# Altium PCB PCB1.PcbDoc (part 1 of 4)
Units mm, origin at the board's own origin, x right, y up, seen from the top; angles counter-clockwise.
Board outline 159.38 x 83.25 mm, 8 copper layers (Top Layer 1, GND, Signal 1, Signal 2, Power, Signal 3, Signal 4, Bottom Layer), stack 1.998 mm thick; 345 components, 291 nets, 1244 pads, 614 vias.
Unrouted connection lines stored in the file: 12.
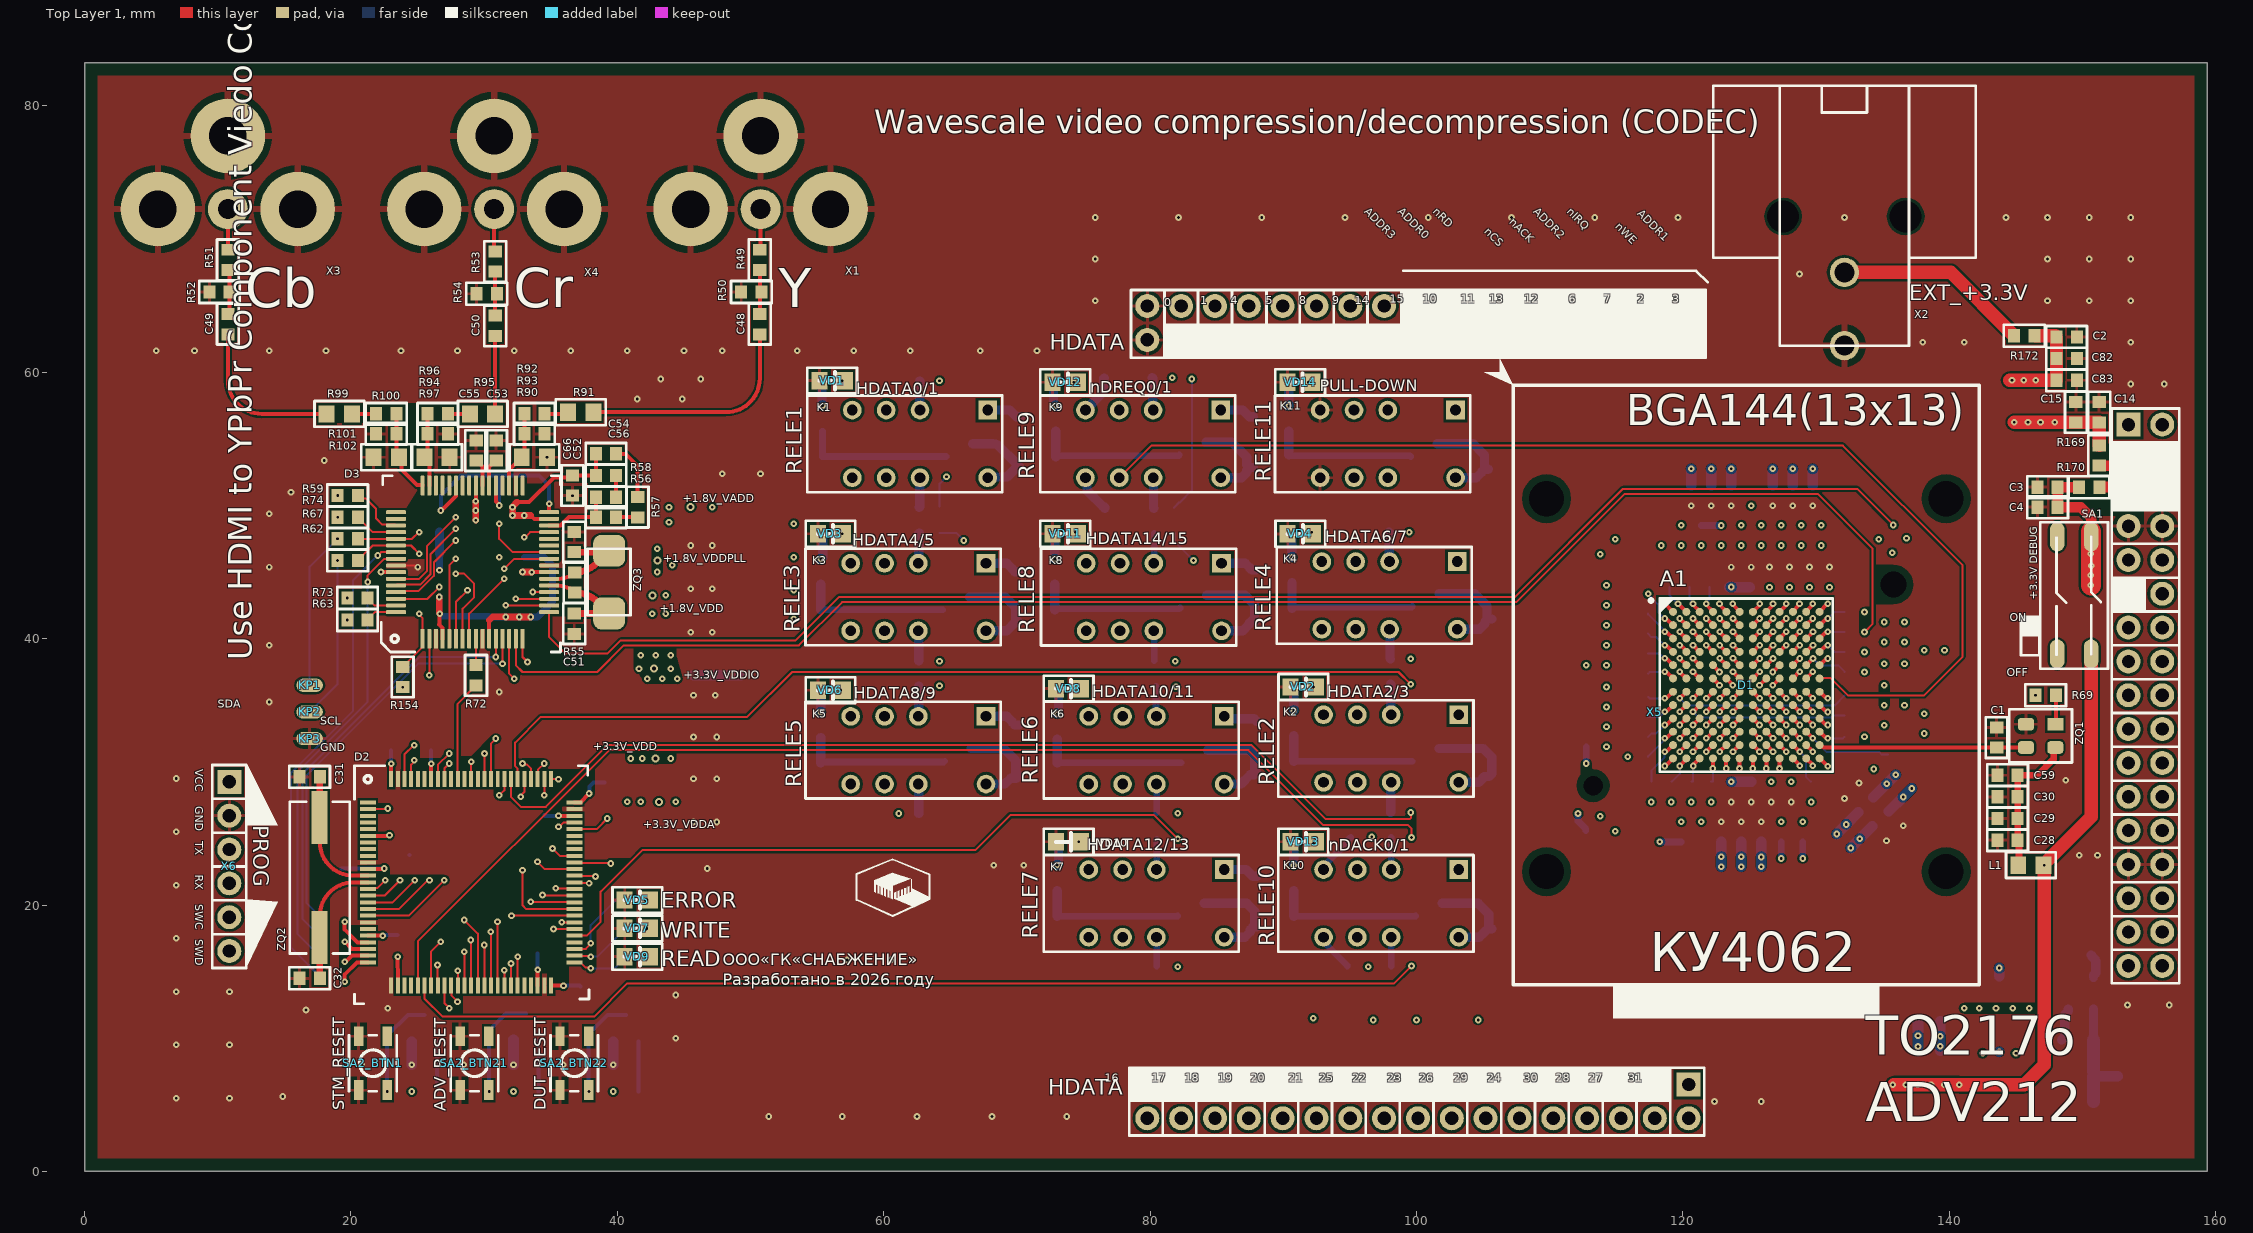
[diagram p0: Top Layer 1 view]
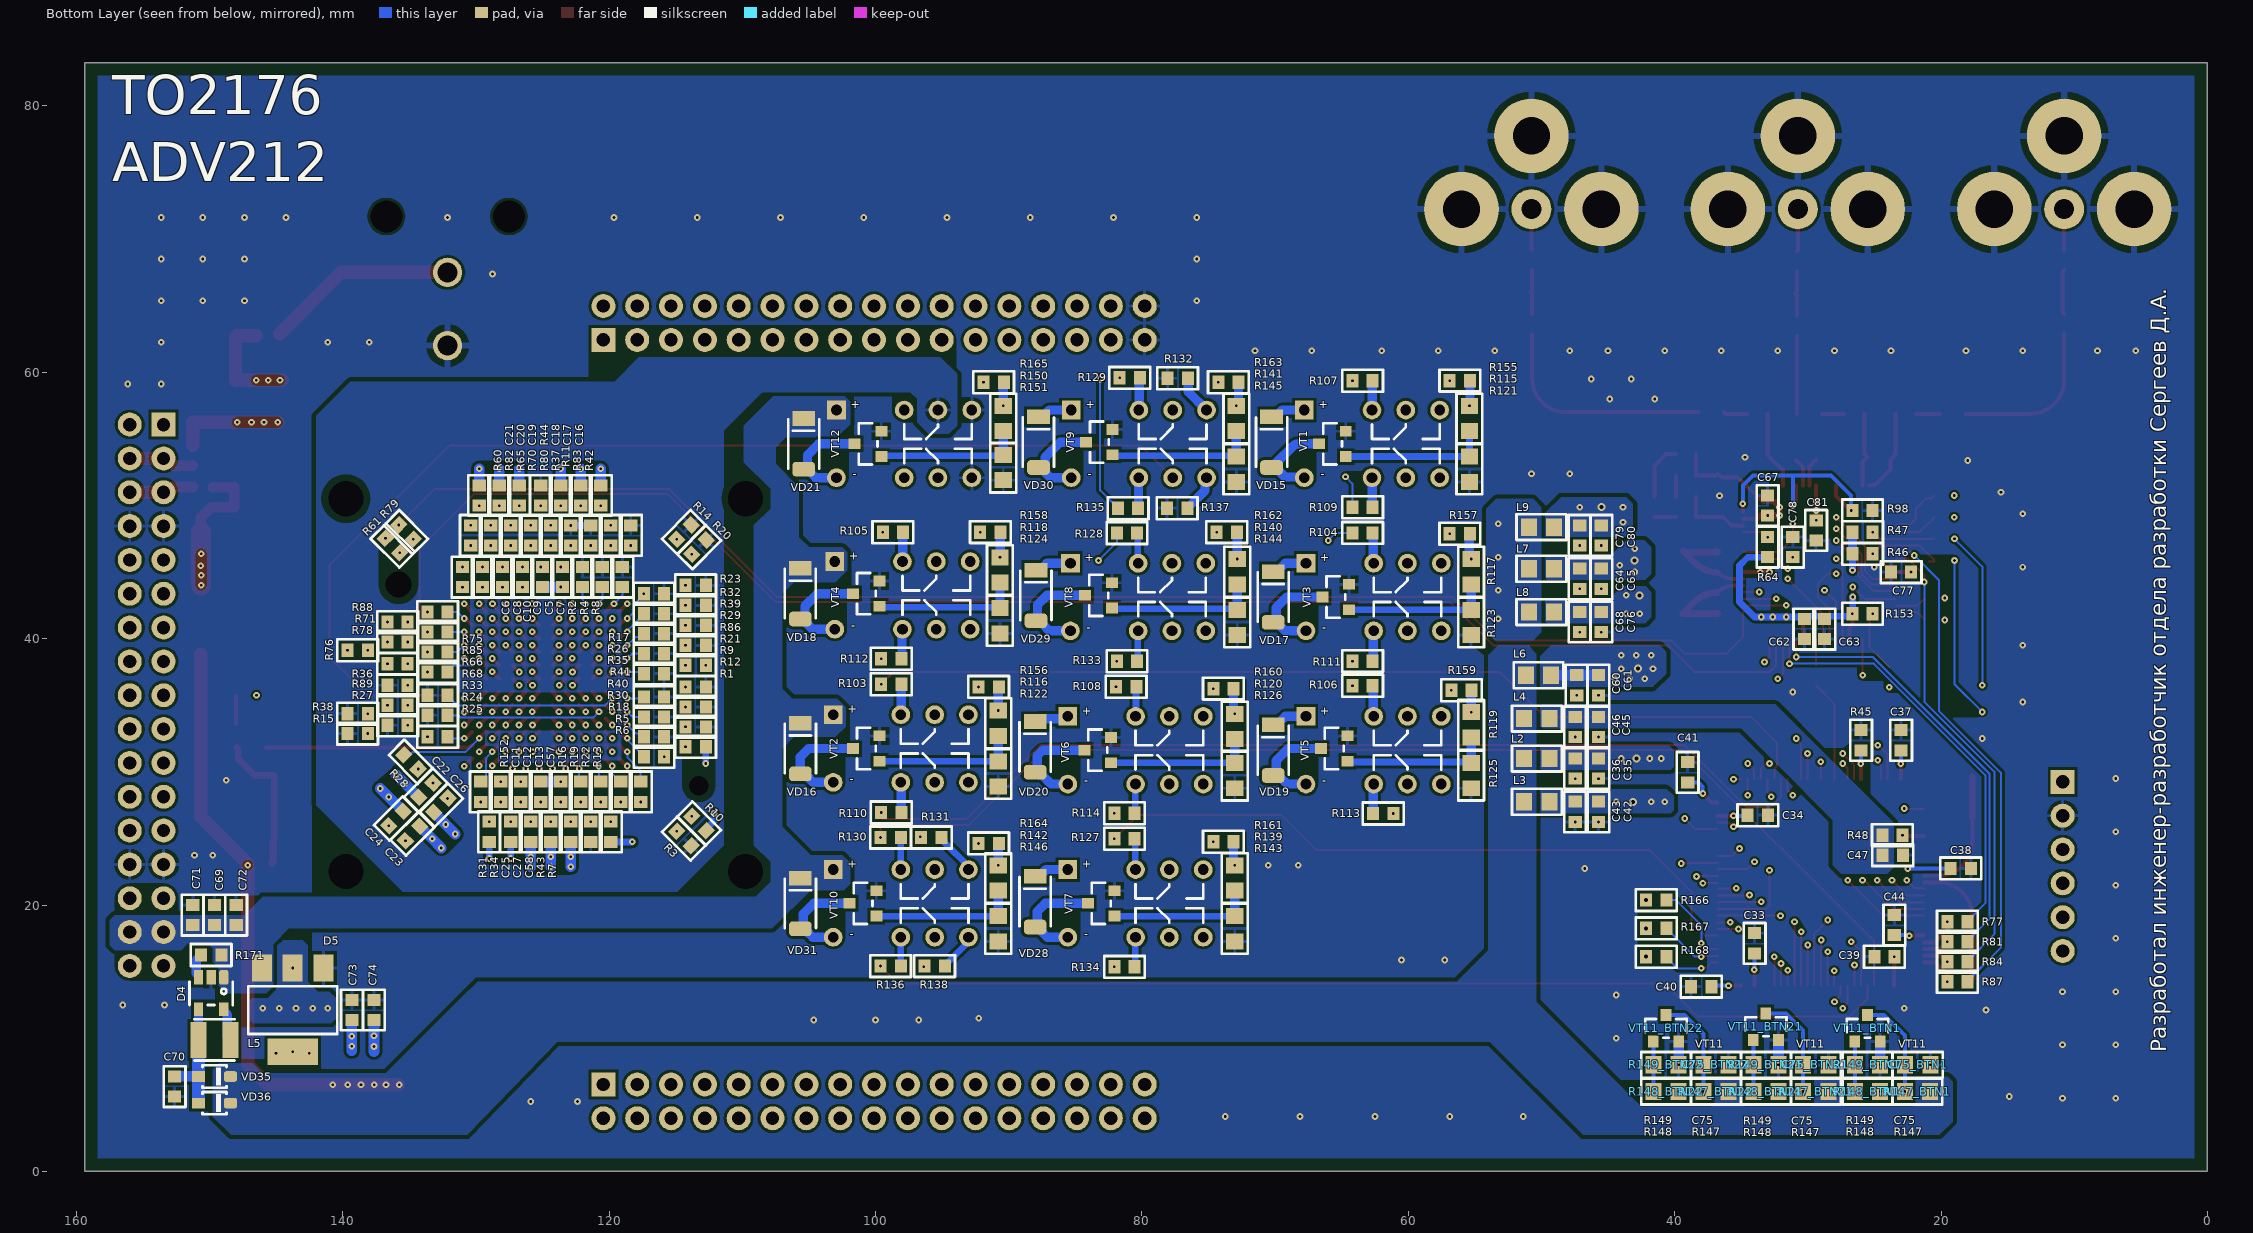
[diagram p1: Bottom Layer view, seen from below]
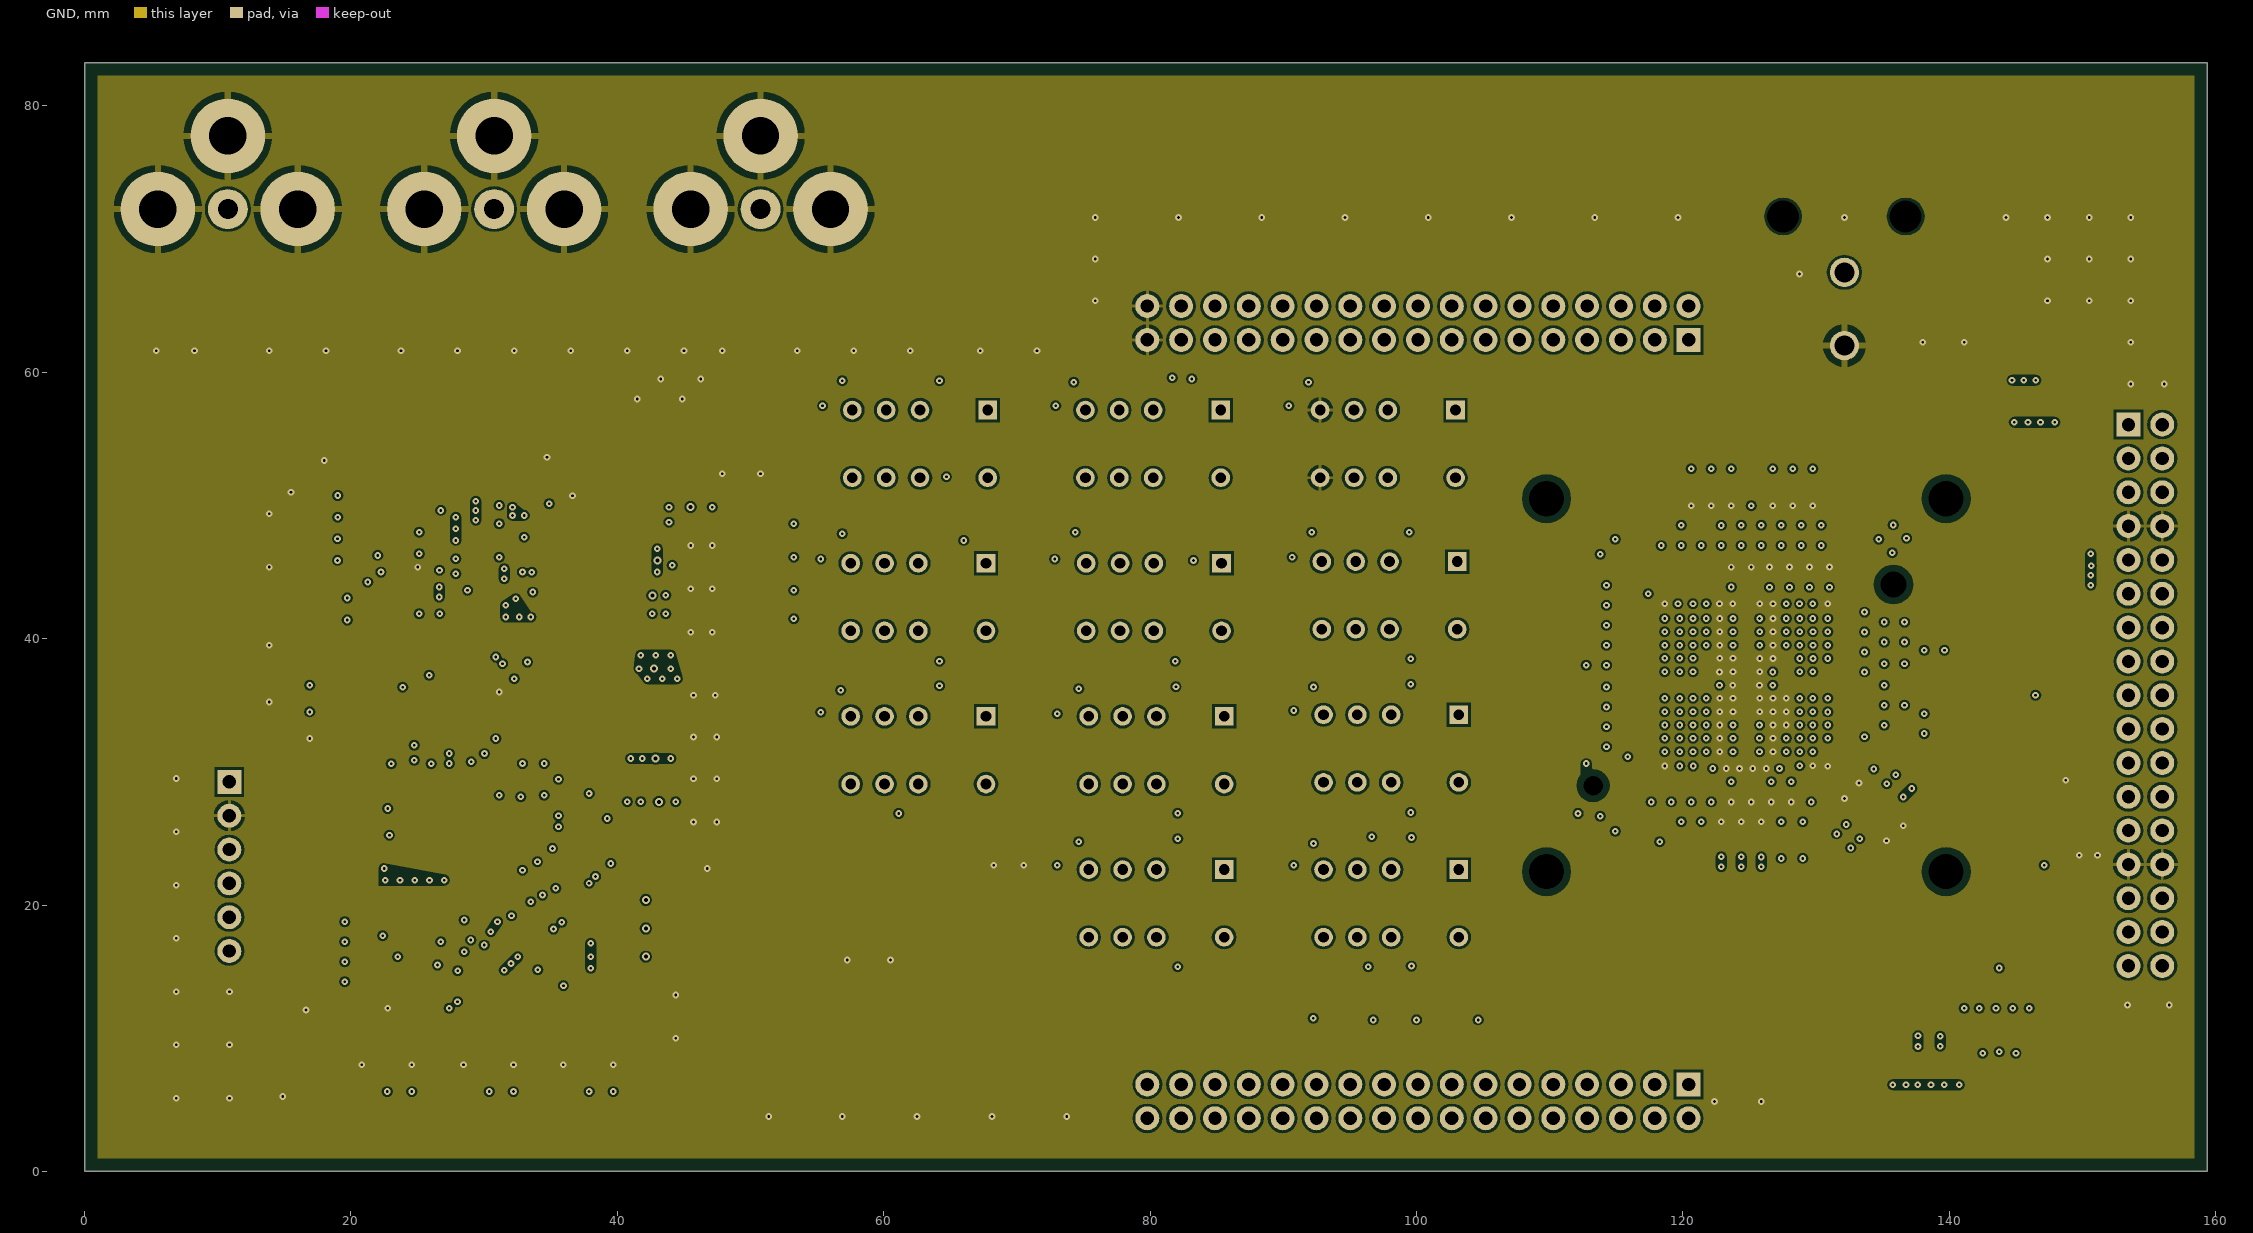
[diagram p2: GND]
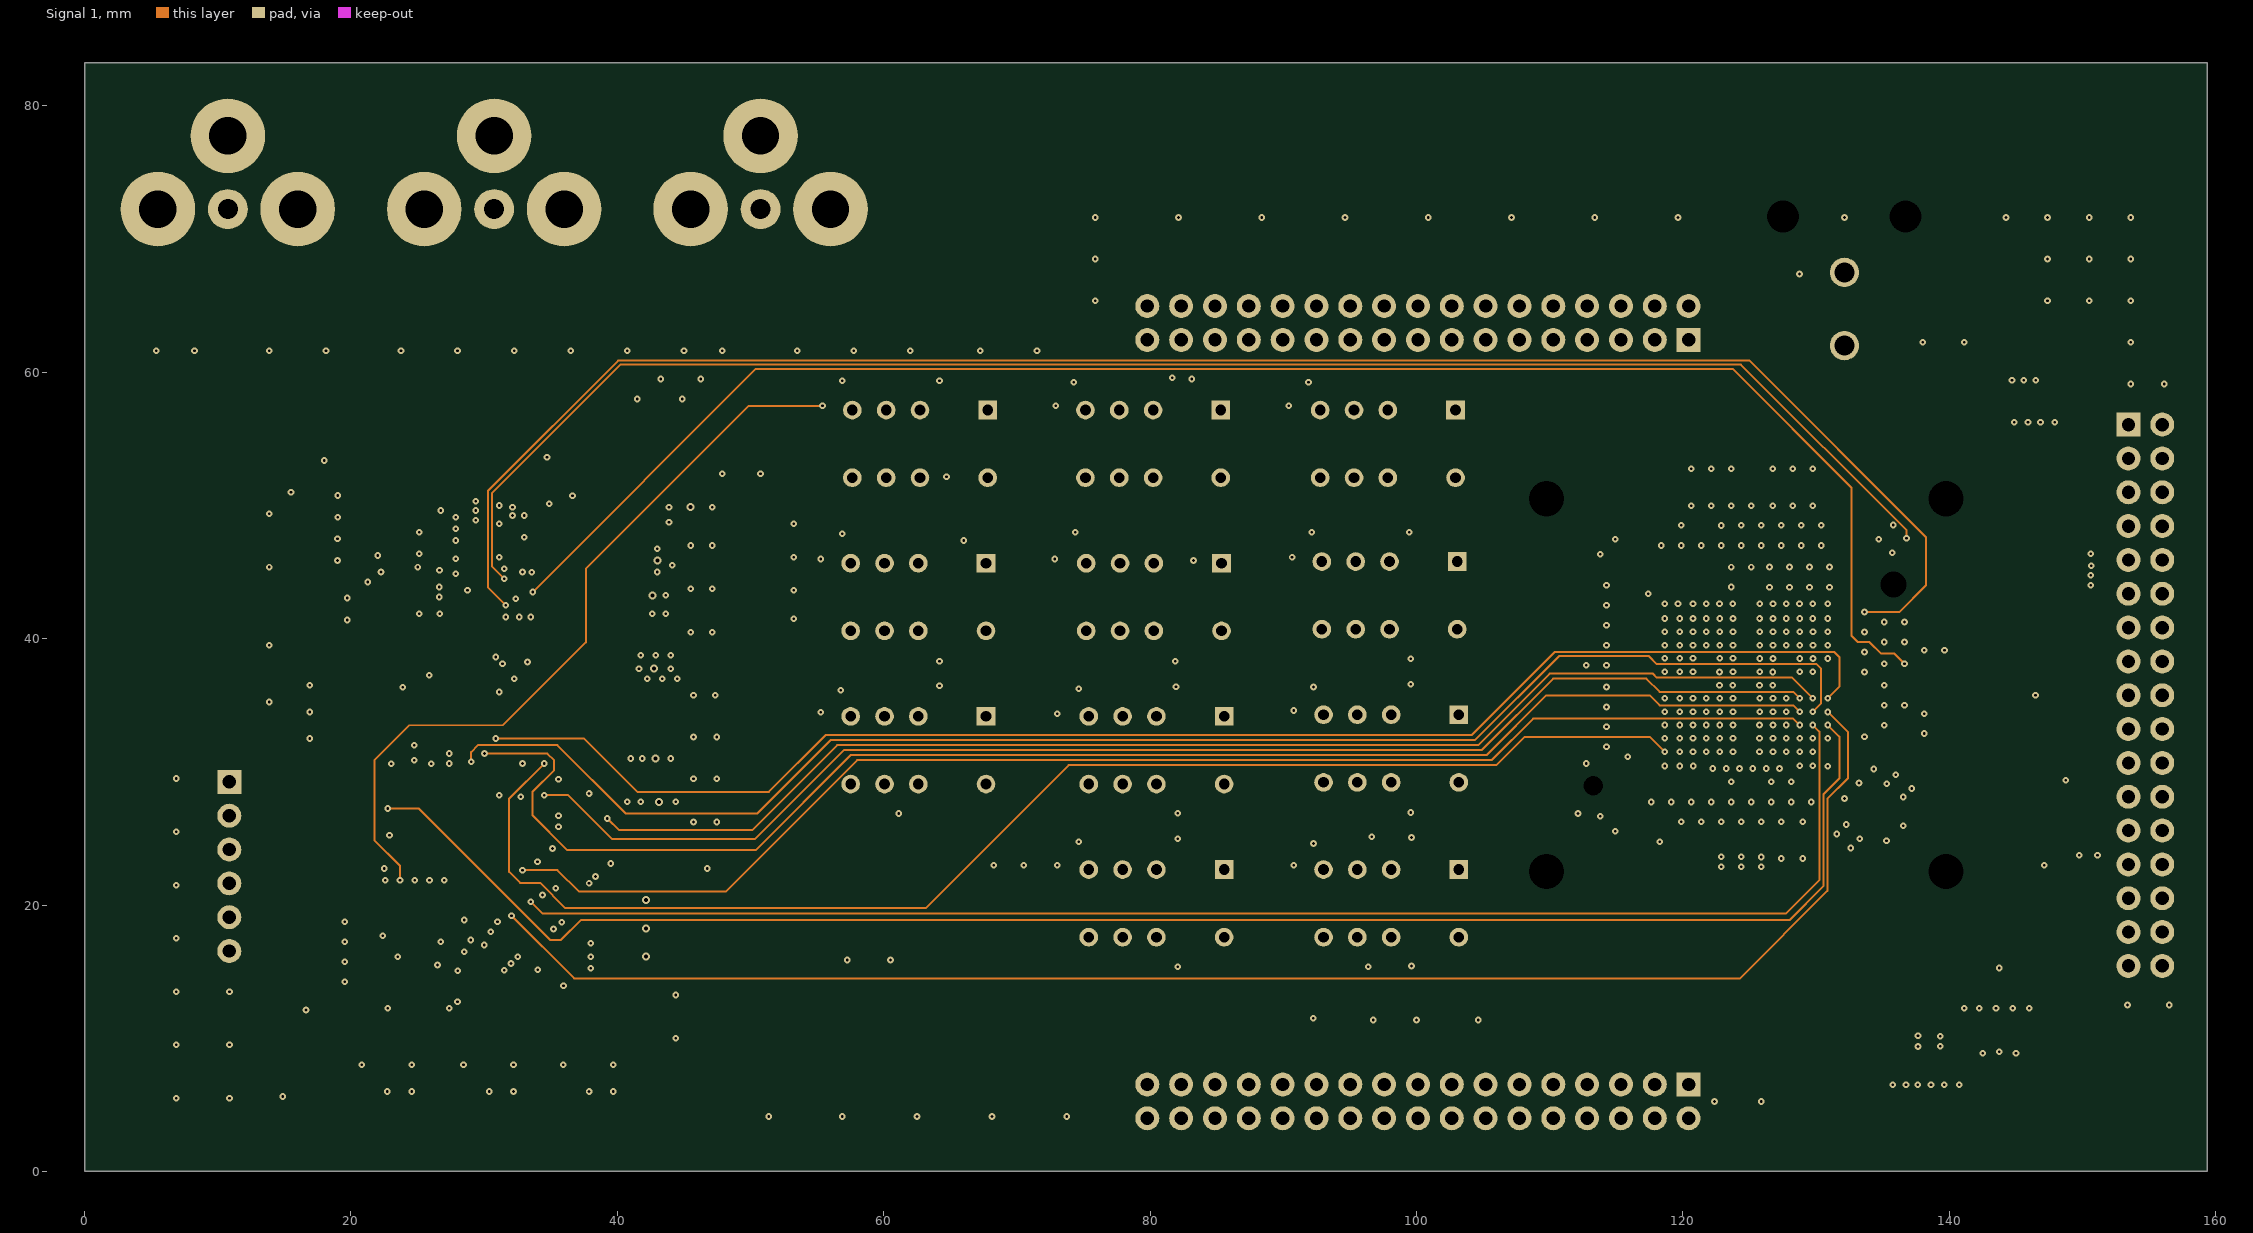
[diagram p3: Signal 1]
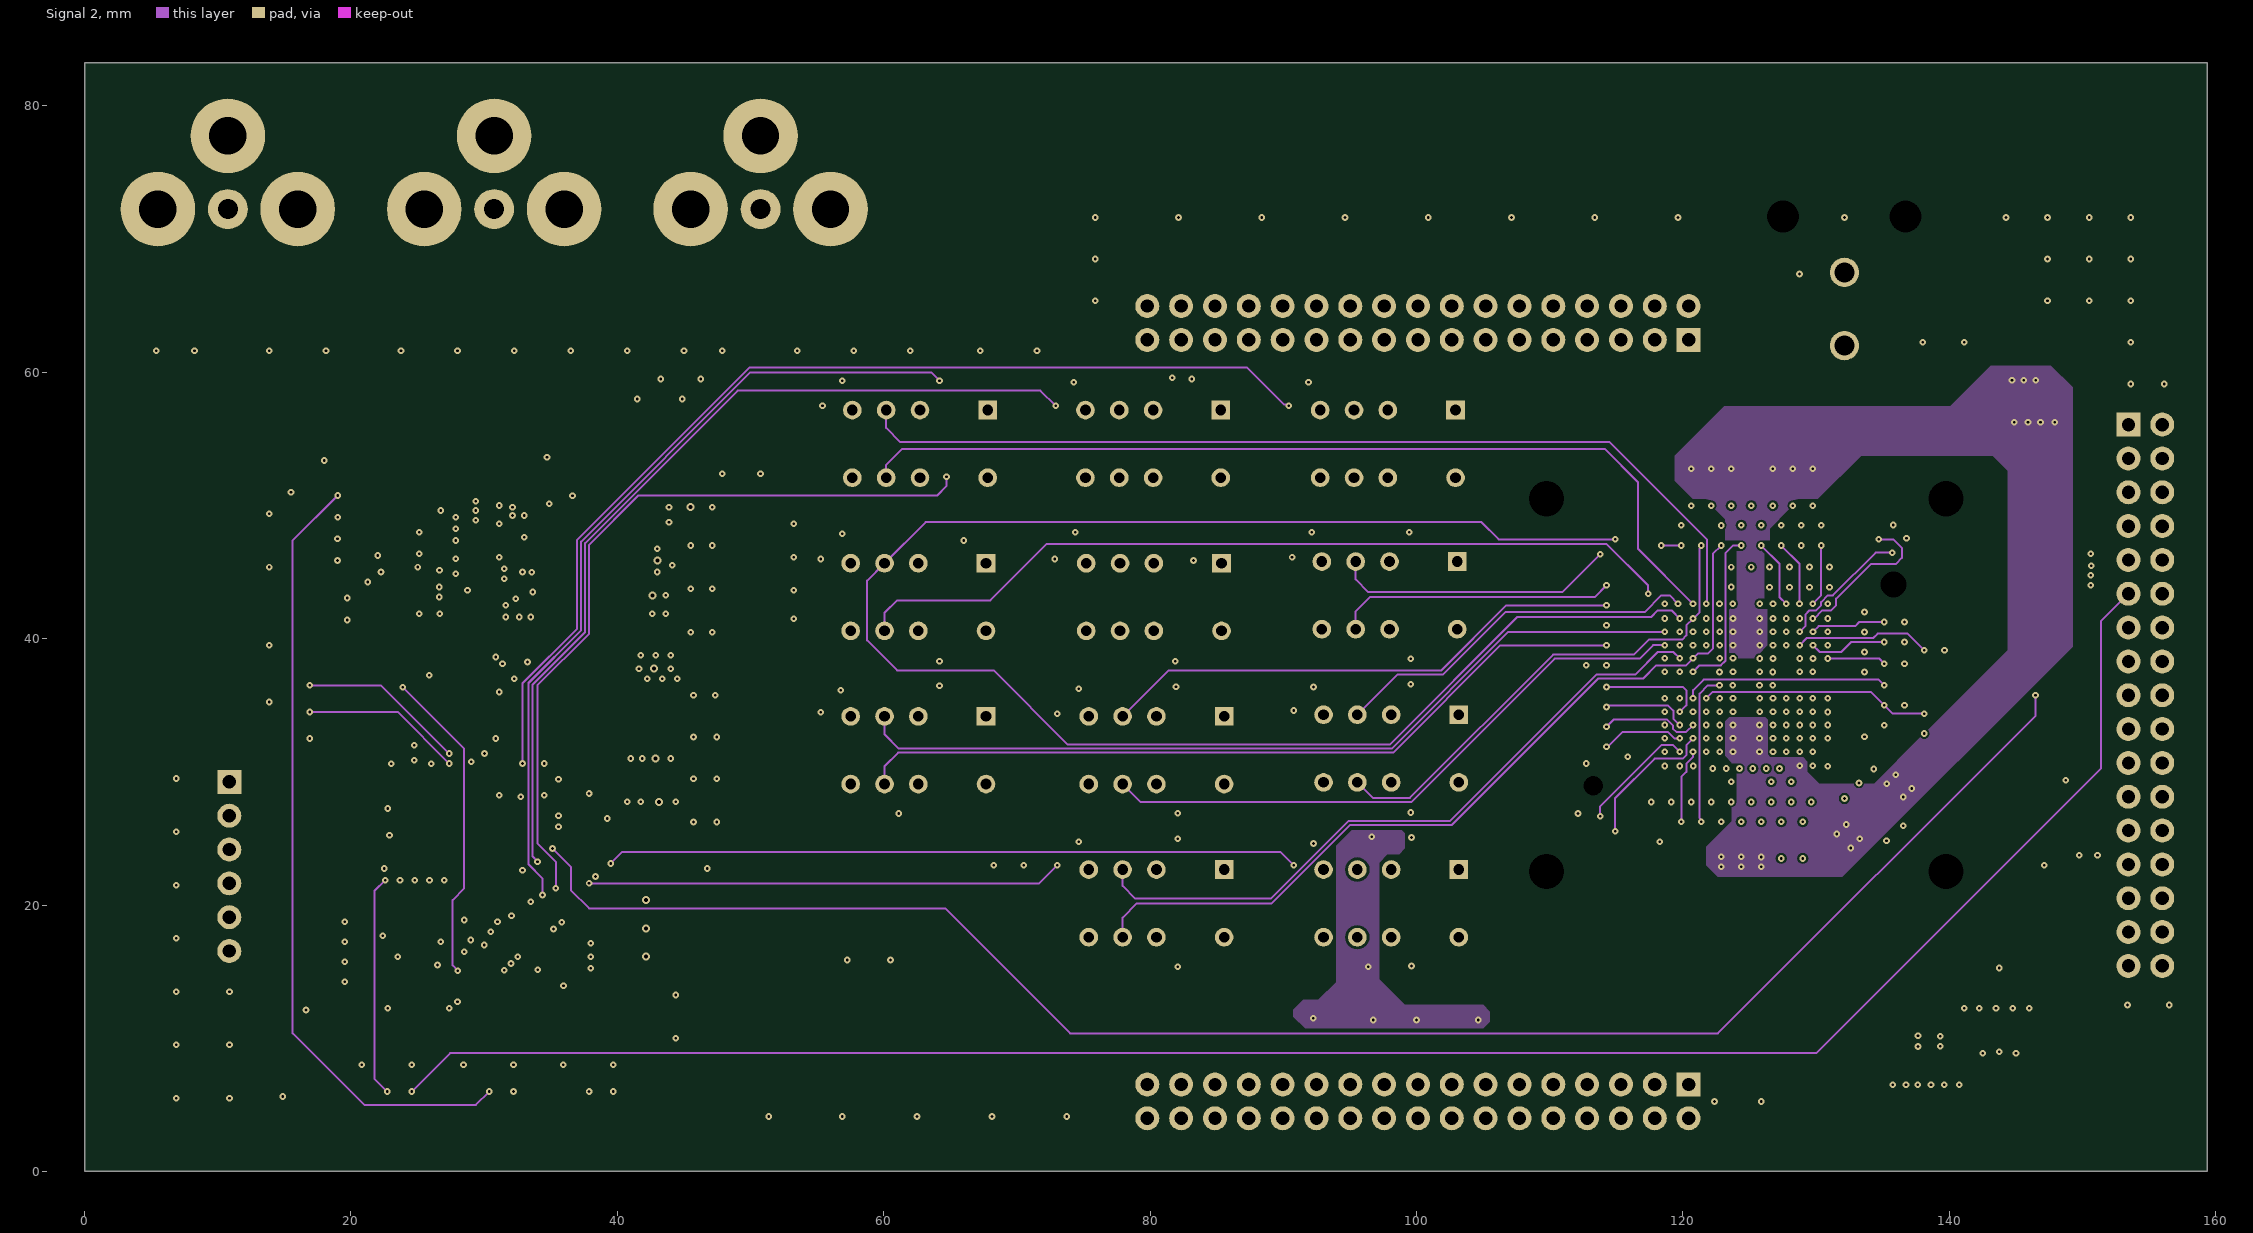
[diagram p4: Signal 2]
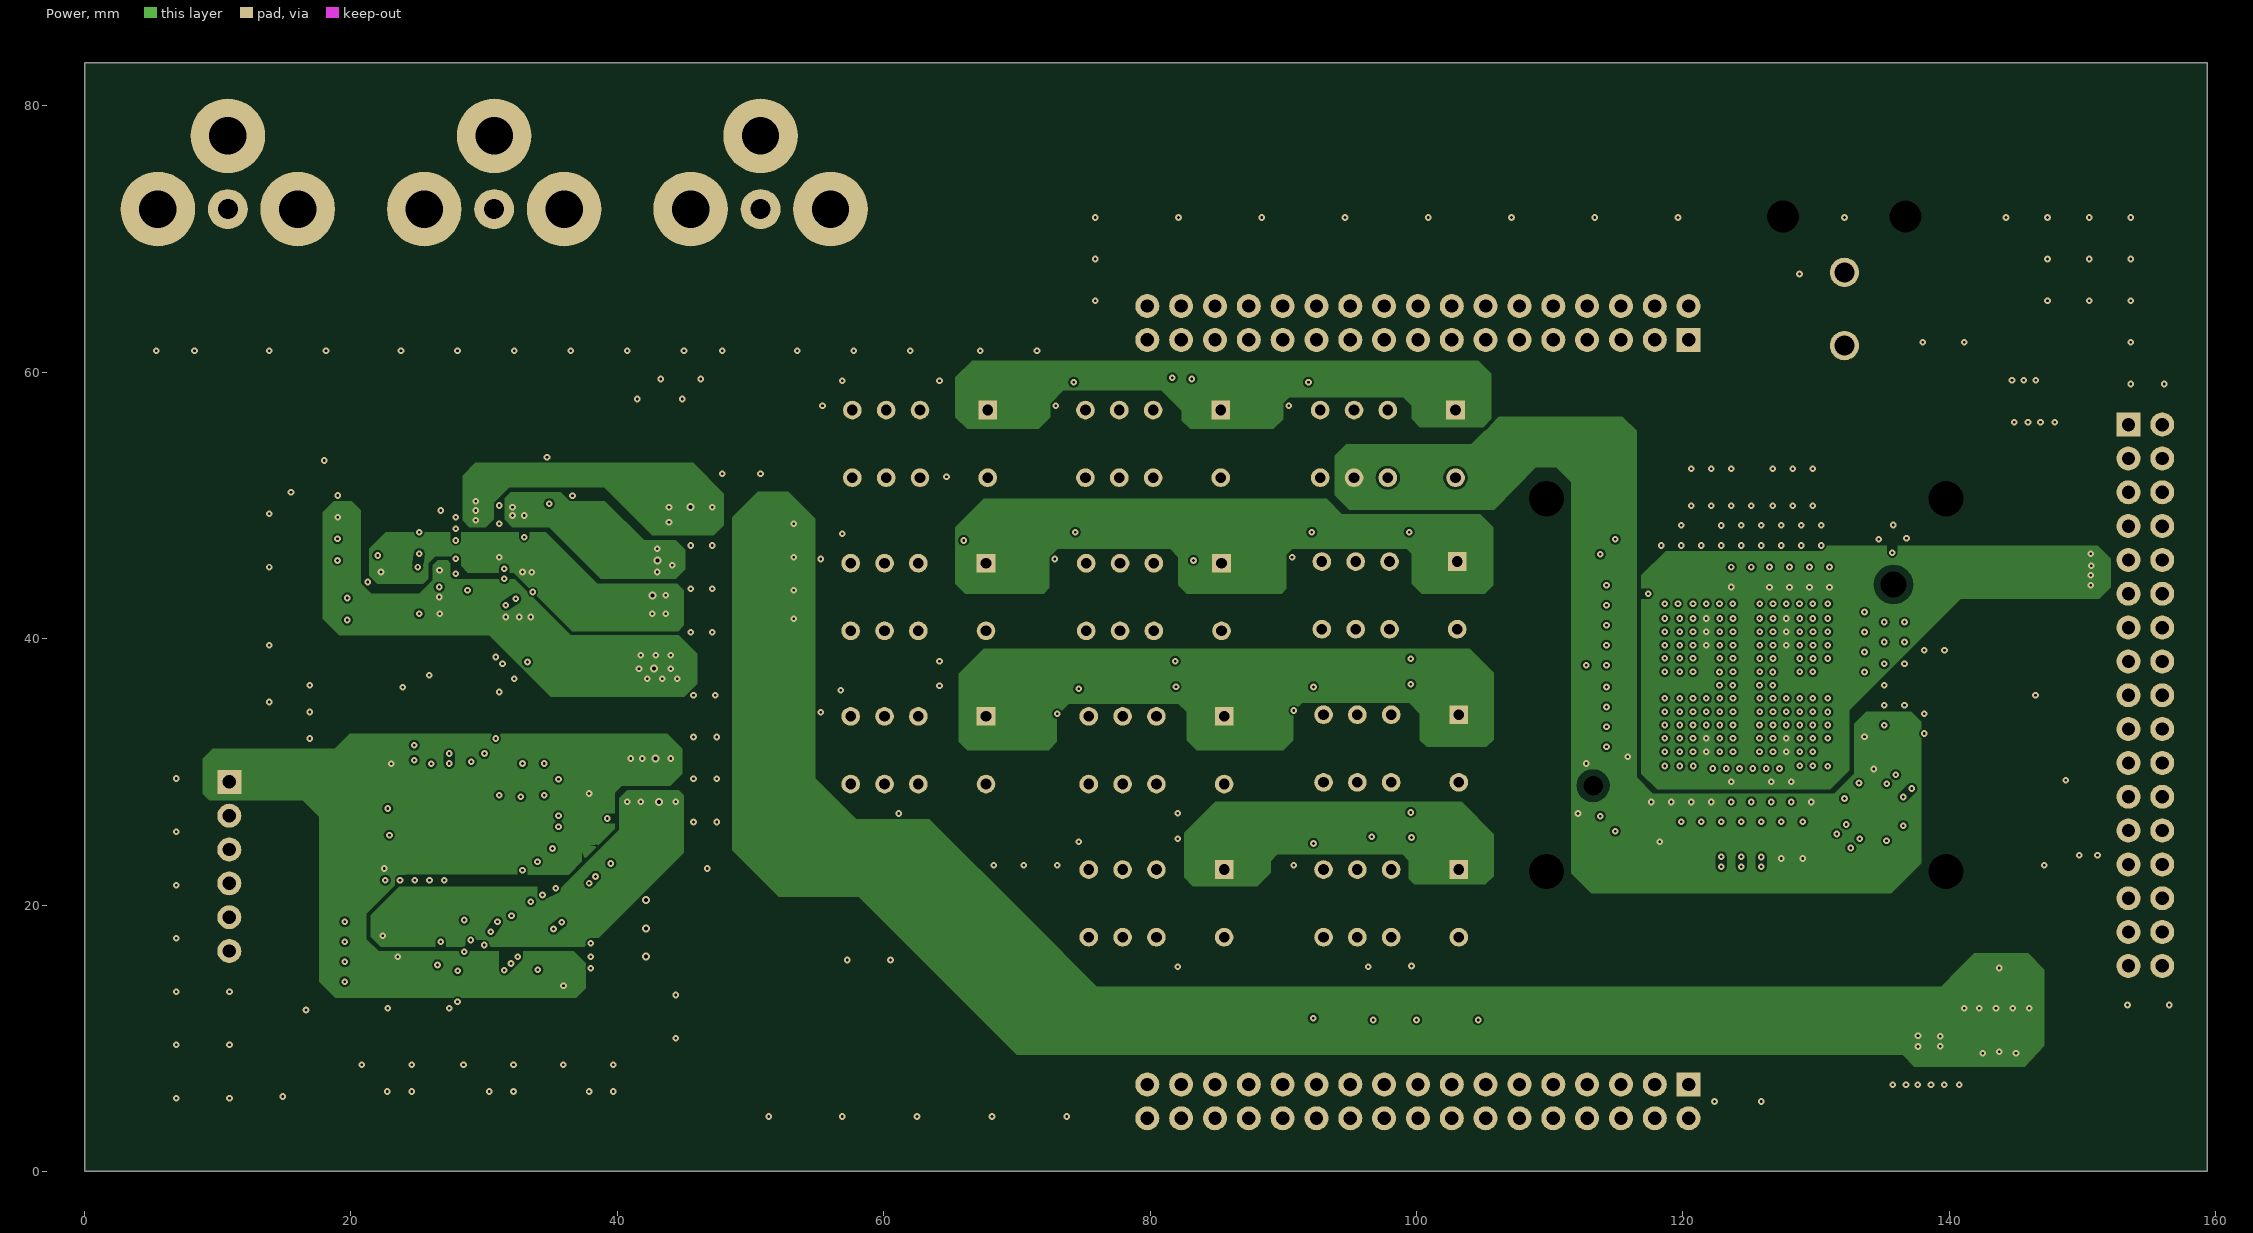
[diagram p5: Power]
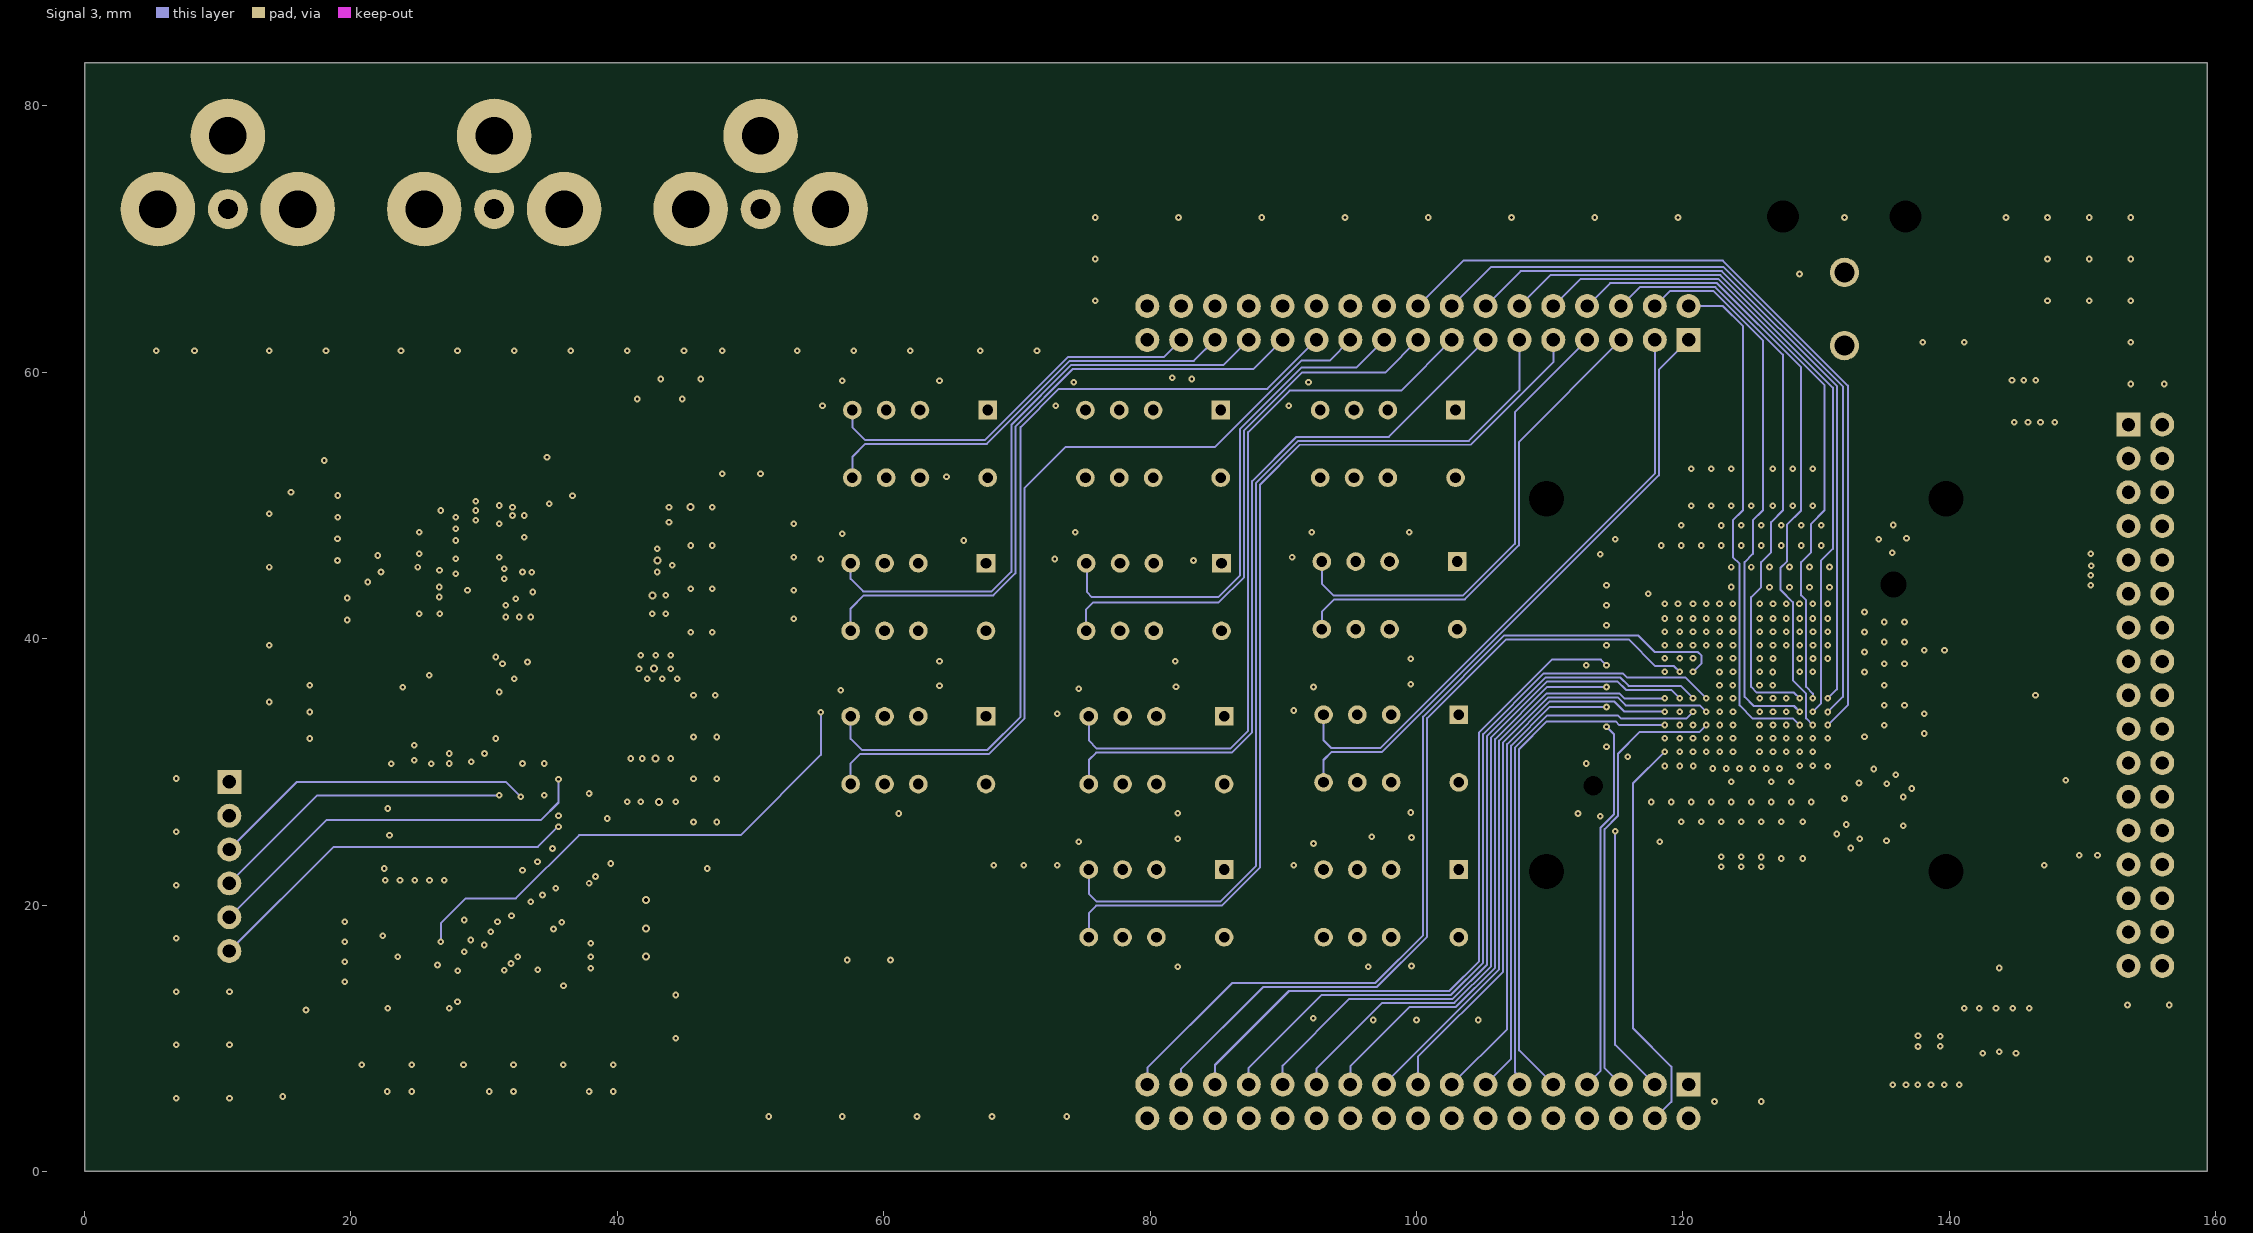
[diagram p6: Signal 3]
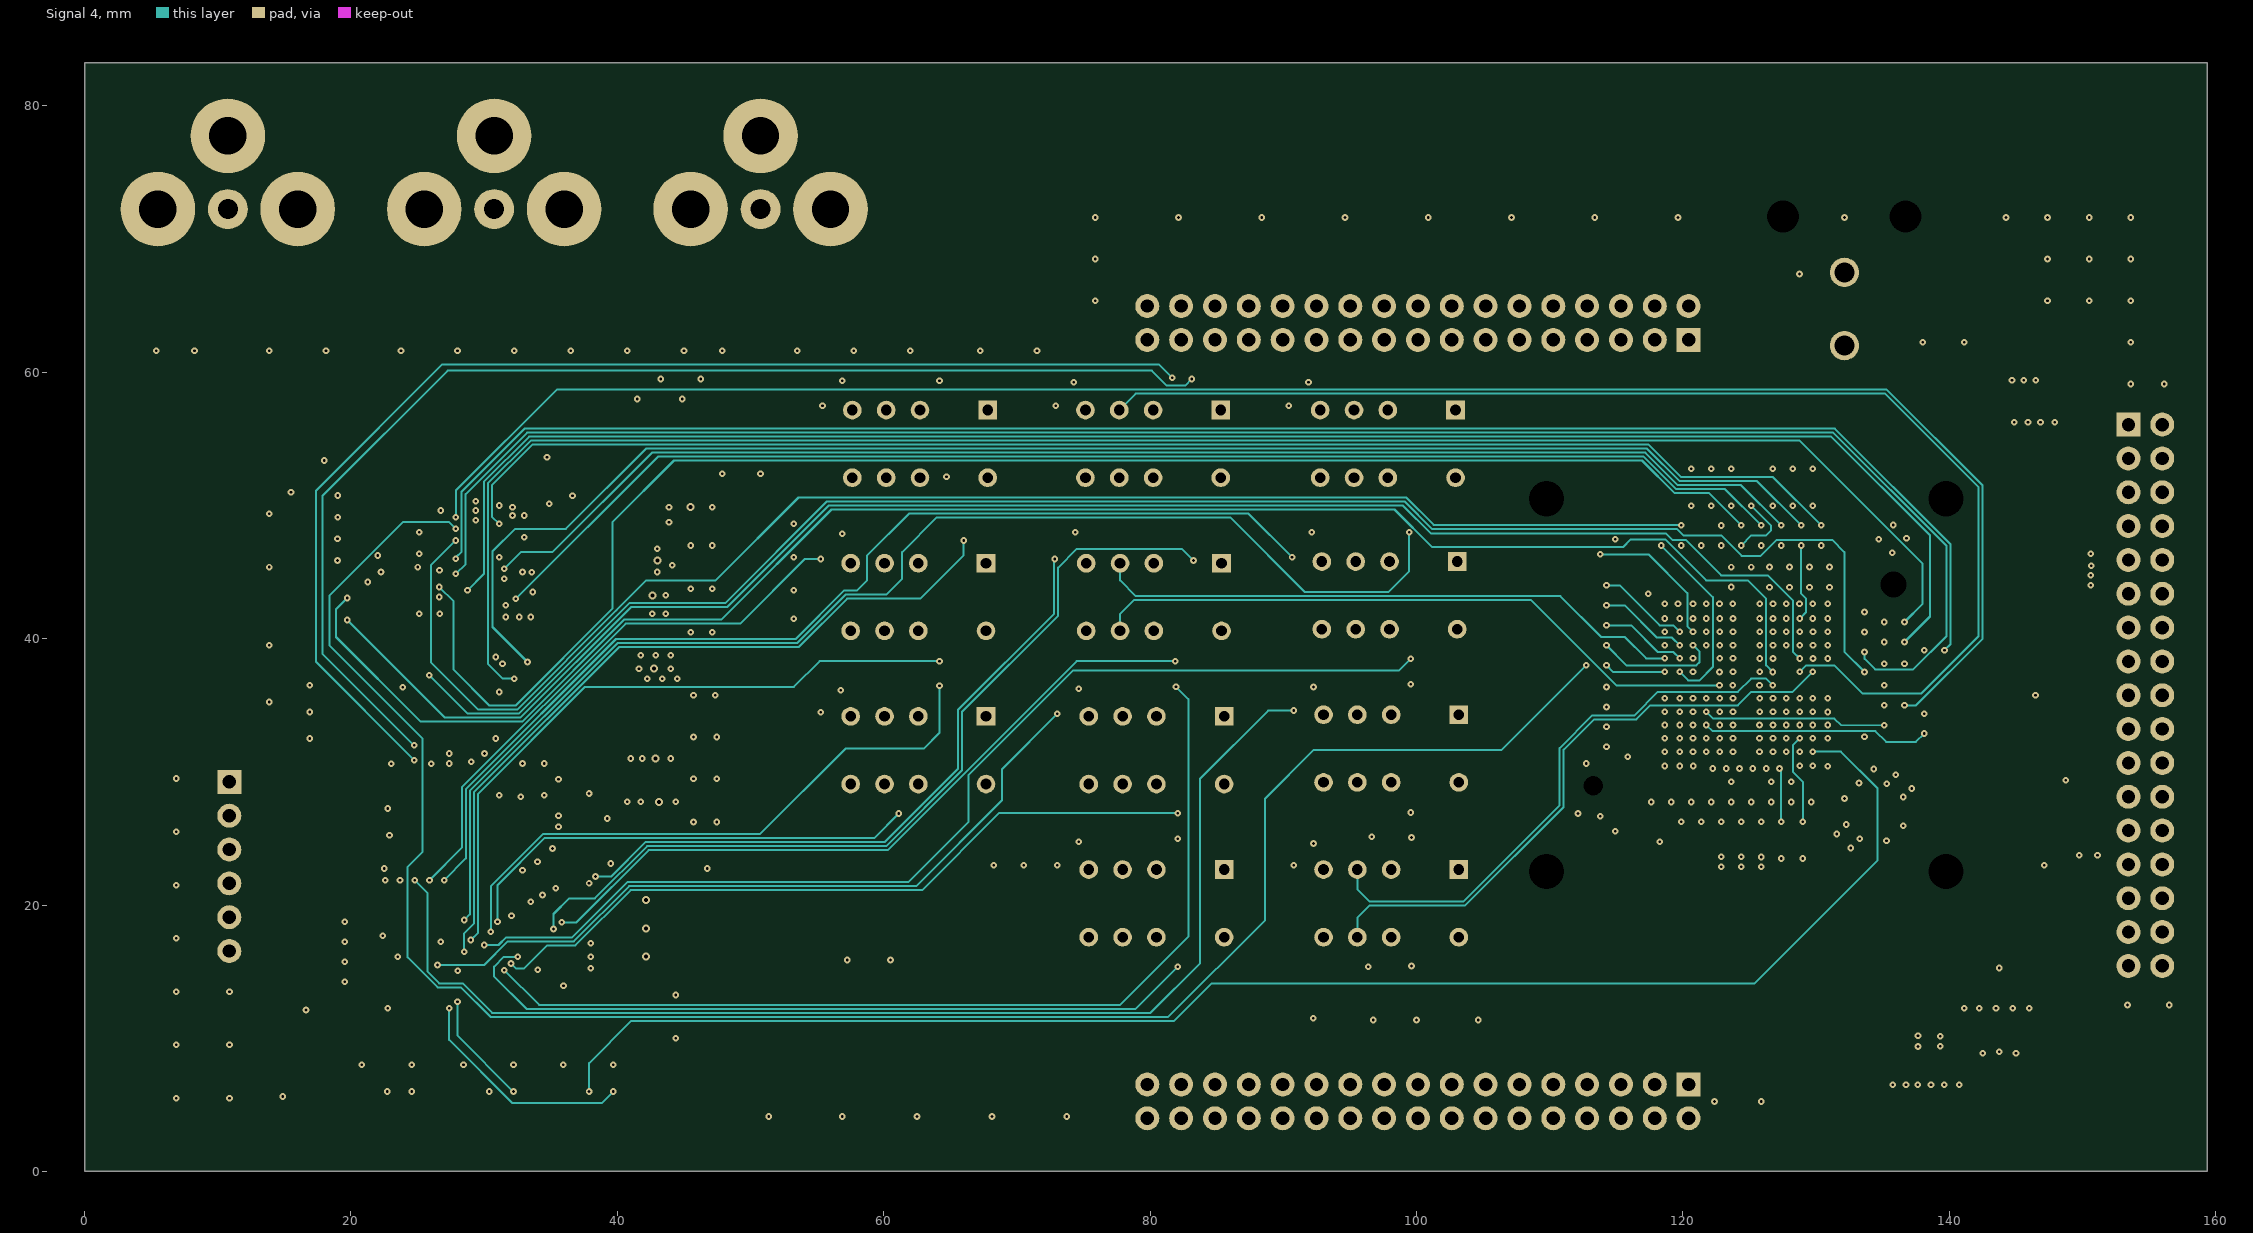
[diagram p7: Signal 4]

## Layer stack, top to bottom
Top Solder: solder mask 0.025, Solder Resist, Dk 4
Top Layer 1: signal copper 0.018
Dielectric 2: prepreg 0.115, FR4 PR, Dk 4.2
GND: signal copper 0.018
Dielectric 6: prepreg 0.115, FR4 PR, Dk 4.2
Signal 1: signal copper 0.018
Dielectric 4: prepreg 0.115, FR4 PR, Dk 4.2
Signal 2: signal copper 0.018
Dielectric 1: core 1.164, FR4 Tg150, Dk 4.6
Power: signal copper 0.018
Dielectric 5: prepreg 0.115, FR4 PR, Dk 4.2
Signal 3: signal copper 0.018
Dielectric 7: prepreg 0.115, FR4 PR, Dk 4.2
Signal 4: signal copper 0.018
Dielectric 3: prepreg 0.115, FR4 PR, Dk 4.2
Bottom Layer: signal copper 0.018
Bottom Solder: solder mask 0.025, Solder Resist, Dk 4

## Board outline
0,0 159.375,0 159.375,83.25 0,83.25

## Design rules (kind name [scope] priority, off if disabled: settings)
Clearance Clearance_2 [HasPad('D1-5')] p1: gap=0.15 ignorepadtopadclearanceinfootprint=FALSE except(0.1: Arc-Via Track-Via SMDPad-Via; 0.2: Arc-Arc Arc-Track Arc-Text Track-Track Track-Text SMDPad-THPad SMDPad-Text THPad-THPad THPad-Via THPad-Text Via-Via Via-Text Fill-Text Poly-Text Region-Text Text-Text; 0.5: Arc-SMDPad Arc-THPad Track-SMDPad Track-THPad SMDPad-Poly THPad-Poly)
Clearance Clearance_1 [NOT OnLayer('Top Layer 1')] p2: gap=0.15 ignorepadtopadclearanceinfootprint=FALSE except(0.1: Arc-Via Track-Via SMDPad-Via; 0.2: Arc-Poly Arc-Text Track-Poly Track-Text SMDPad-THPad SMDPad-Poly SMDPad-Text THPad-THPad THPad-Via THPad-Poly THPad-Text Via-Via Via-Text Fill-Poly Fill-Text Poly-Text Region-Text Text-Text; 0.3: Poly-Poly)
Clearance [All] p3: gap=0.15 ignorepadtopadclearanceinfootprint=FALSE except(0.1: Arc-Arc Arc-Track Arc-Via Track-Track Track-Via SMDPad-Via; 0.2: Arc-Text Track-Text SMDPad-THPad SMDPad-Text THPad-THPad THPad-Via THPad-Text Via-Via Via-Text Fill-Text Poly-Text Region-Text Text-Text)
ComponentClearance [All] p1: gap=0 collisioncheckmode=3 verticalgap=0 showdistances=FALSE
Height [All] p1: minheight=0 maxheight=1817.048 prefheight=0
HoleSize [All] p1: absolutevalues=TRUE maxlimit=10 minlimit=0.2 maxpercent=80.000 minpercent=20.000
MinimumSolderMaskSliver [All] p1: minsoldermaskwidth=0.05
PolygonConnect PolygonConnect_GND [InNet('GND') vs (InComponent('X1') OR InComponent('X2') OR InComponent('X3') OR InComponent('X4'))] p1: thpad.connectstyle=Relief thpad.reliefconductorwidth=0.5 thpad.reliefentries=4 thpad.polygonreliefangle="90 Angle" thpad.airgapwidth=0.5 smdpad.connectstyle=Relief smdpad.reliefconductorwidth=0.254 smdpad.reliefentries=4 smdpad.polygonreliefangle="90 Angle" smdpad.airgapwidth=0.254 via.connectstyle=Direct via.reliefconductorwidth=0.254 via.reliefentries=4 via.polygonreliefangle="90 Angle" via.airgapwidth=0.254
PolygonConnect PolygonConnect_GND_2 [InNet('GND') vs (InComponent('D2') OR InComponent('D3'))] p2: thpad.connectstyle=Relief thpad.reliefconductorwidth=0.254 thpad.reliefentries=4 thpad.polygonreliefangle="90 Angle" thpad.airgapwidth=0.254 smdpad.connectstyle=Direct smdpad.reliefconductorwidth=0.254 smdpad.reliefentries=4 smdpad.polygonreliefangle="90 Angle" smdpad.airgapwidth=0.254 via.connectstyle=Direct via.reliefconductorwidth=0.254 via.reliefentries=4 via.polygonreliefangle="90 Angle" via.airgapwidth=0.254
PolygonConnect PolygonConnect_GND_1 [InNet('GND')] p3: thpad.connectstyle=Relief thpad.reliefconductorwidth=0.254 thpad.reliefentries=4 thpad.polygonreliefangle="90 Angle" thpad.airgapwidth=0.254 smdpad.connectstyle=Relief smdpad.reliefconductorwidth=0.254 smdpad.reliefentries=4 smdpad.polygonreliefangle="90 Angle" smdpad.airgapwidth=0.254 via.connectstyle=Direct via.reliefconductorwidth=0.254 via.reliefentries=4 via.polygonreliefangle="90 Angle" via.airgapwidth=0.254
PolygonConnect PolygonConnect_DGND_1 [InNet('DGND_1')] p4: thpad.connectstyle=Relief thpad.reliefconductorwidth=0.254 thpad.reliefentries=4 thpad.polygonreliefangle="90 Angle" thpad.airgapwidth=0.254 smdpad.connectstyle=Relief smdpad.reliefconductorwidth=0.254 smdpad.reliefentries=4 smdpad.polygonreliefangle="90 Angle" smdpad.airgapwidth=0.254 via.connectstyle=Direct via.reliefconductorwidth=0.254 via.reliefentries=4 via.polygonreliefangle="90 Angle" via.airgapwidth=0.254
PolygonConnect PolygonConnect_ALL_NETS [All] p5: connectstyle=Direct reliefconductorwidth=0.254 reliefentries=4 polygonreliefangle="90 Angle" airgapwidth=0.254
RoutingVias [All] p1: holewidth=0.2 width=0.5 viastyle="Through Hole" minholewidth=0.2 minwidth=0.5 maxholewidth=0.6 maxwidth=1.2
SilkToSilkClearance [All] p1: silktosilkclearance=0
SilkToSolderMaskClearance [IsPad] p1: minsilkscreentomaskgap=0 clearancetoexposedcopper=TRUE
SolderMaskExpansion [All] p1: expansion=0.102 istentingtop=FALSE
Width [All] p1: maxlimit=2 minlimit=0.1 preferedwidth=0.3
24 further rules are at their usual default settings.

## Classes and differential pairs
component class BTN22: C75_BTN22 R147_BTN22 R148_BTN22 R149_BTN22 SA2_BTN22 VT11_BTN22
component class BTN21: C75_BTN21 R147_BTN21 R148_BTN21 R149_BTN21 SA2_BTN21 VT11_BTN21
channel class Button: BTN1 BTN2
component class BTN1: C75_BTN1 R147_BTN1 R148_BTN1 R149_BTN1 SA2_BTN1 VT11_BTN1
component class REL: K1 K2 K3 K4 K5 K6 K7 K8 K9 K10 K11 R103 R104 R105 R106 R107 R108 R109 R110 R111 R112 R113 R114 R115 R116 R117 R118 R119 R120 R121 R122 R123 R124 R125 R126 R127 R128 R129 R130 R131 R132 R133 R134 R135 R136 R137 R138 R139 R140 R141 R142 R143 R144 R145 R146 R150 R151 VD15 VD16 VD17 VD18 VD19 VD20 VD21 VD28 VD29 VD30 VD31 VT1 VT2 VT3 VT4 VT5 VT6 VT7 VT8 VT9 VT10 VT12
component class STM32: C31 C32 C33 C34 C35 C36 C37 C38 C39 C40 C41 C42 C43 C44 C45 C46 C47 D2 L2 L3 L4 R45 R48 R69 R155 R156 R157 R158 R159 R160 R161 R162 R163 R164 R165 R166 R167 R168 VD1 VD2 VD3 VD4 VD5 VD6 VD7 VD8 VD9 VD10 VD11 VD12 VD13 VD14 X6 ZQ2
component class PS: C69 C70 C71 C72 C73 C74 D4 D5 L5 R171 VD35 VD36
component class Main: C48 C49 C50 KP1 KP2 KP3 R49 R50 R51 R52 R53 R54 SA1 X1 X2 X3 X4
component class F2K: R169 R170 X5
component class ADV7180: C51 C52 C53 C54 C55 C56 C60 C61 C62 C63 C64 C65 C66 C67 C68 C76 C77 C78 C79 C80 C81 D3 L6 L7 L8 L9 R46 R47 R55 R56 R57 R58 R59 R60 R61 R62 R63 R64 R65 R66 R67 R68 R70 R71 R72 R73 R74 R75 R76 R77 R78 R79 R80 R81 R82 R83 R84 R85 R86 R87 R88 R89 R90 R91 R92 R93 R94 R95 R96 R97 R98 R99 R100 R101 R102 R153 R154 ZQ3
component class ADV212: C1 C2 C3 C4 C5 C6 C7 C8 C9 C10 C11 C12 C13 C14 C15 C16 C17 C18 C19 C20 C21 C22 C23 C24 C25 C26 C27 C28 C29 C30 C57 C58 C59 C82 C83 D1 L1 R1 R2 R3 R4 R5 R6 R7 R8 R9 R10 R11 R12 R13 R14 R15 R16 R17 R18 R19 R20 R21 R22 R23 R24 R25 R26 R27 R28 R29 R30 R31 R32 R33 R34 R35 R36 R37 R38 R39 R40 R41 R42 R43 R44 R152 R172 ZQ1

## Components (designator, comment, footprint, x,y, rotation, side; value= is the part's Value field where it differs from the comment)
C1 "15pF" 0603 143.552,32.577 r270 top
C2 "10uF" 0603 148.81,62.654 r0 top
C3 "10uF" 0603 147.375,51.375 r180 top
C4 "1uF" 0603 147.375,49.875 r180 top
C5 "0.1uF" 0603 125,44.625 r90 bottom
C6 "0.1uF" 0603 131,44.625 r90 bottom
C7 "0.1uF" 0603 123.5,44.625 r90 bottom
C8 "0.1uF" 0603 129.5,44.625 r90 bottom
C9 "0.1uF" 0603 126.5,44.625 r90 bottom
C10 "0.1uF" 0603 128,44.625 r90 bottom
C11 "0.1uF" 0603 128.125,28.5 r270 bottom
C12 "0.1uF" 0603 126.625,28.5 r270 bottom
C13 "0.1uF" 0603 125.125,28.5 r270 bottom
C14 "10uF" 0603 151.25,57 r90 top
C15 "1uF" 0603 149.5,57 r90 top
C16 "0.1uF" 0603 120.625,50.75 r270 bottom
C17 "0.1uF" 0603 122.125,50.75 r270 bottom
C18 "0.1uF" 0603 123.625,50.75 r270 bottom
C19 "0.1uF" 0603 126.75,50.75 r270 bottom
C20 "0.1uF" 0603 128.25,50.75 r270 bottom
C21 "0.1uF" 0603 129.75,50.75 r270 bottom
C22 "0.1uF" 0603 133.75,28.625 r135 bottom
C23 "0.1uF" 0603 134.75,25.375 r315 bottom
C24 "0.1uF" 0603 136,26.5 r315 bottom
C25 "0.1uF" 0603 125.875,25.5 r90 bottom
C26 "0.1uF" 0603 132.625,27.5 r135 bottom
C27 "0.1uF" 0603 124.375,25.5 r90 bottom
C28 "10uF" 0603 144.375,24.875 r180 top
C29 "1uF" 0603 144.375,26.5 r180 top
C30 "0.1uF" 0603 144.375,28.125 r180 top
C31 "18pF" 0603 16.895,29.625 r180 top
C32 "18pF" 0603 16.895,14.5 r180 top
C33 "2.2uF" 0603 34,17.125 r270 bottom
C34 "2.2uF" 0603 33.75,26.75 r0 bottom
C35 "4.7uF" 0603 45.719,30.25 r90 bottom
C36 "10uF" 0603 47.469,30.25 r90 bottom
C37 "0.1uF" 0603 23,32.375 r270 bottom
C38 "0.1uF" 0603 18.52,22.75 r0 bottom
C39 "0.1uF" 0603 24.25,16.125 r180 bottom
C40 "0.1uF" 0603 38,13.875 r180 bottom
C41 "0.1uF" 0603 39.022,29.964 r270 bottom
C42 "4.7uF" 0603 45.719,27 r90 bottom
C43 "10uF" 0603 47.469,27 r90 bottom
C44 "0.1uF" 0603 23.5,18.5 r270 bottom
C45 "4.7uF" 0603 45.719,33.375 r90 bottom
C46 "10uF" 0603 47.469,33.375 r90 bottom
C47 "0.1uF" 0603 23.625,23.75 r0 bottom
C48 "0.1uF" 0603 50.694,63.614 r90 top
C49 "0.1uF" 0603 10.76,63.614 r90 top
C50 "1uF" 0603 30.826,63.487 r90 top
C51 "47pF" 0603 36.76,41.125 r270 top
C52 "47pF" 0603 36.76,47.25 r90 top
C53 "0.1uF" 0603 30.895,54.125 r270 top
C54 "10nF" 0603 39.145,53.875 r180 top
C55 "0.1uF" 0603 29.395,54.125 r270 top
C56 "82nF" 0603 39.145,52.25 r180 top
C57 "0.1uF" 0603 123.625,28.5 r270 bottom
C58 "0.1uF" 0603 122.875,25.5 r90 bottom
C59 "0.1uF" 0603 144.375,29.75 r180 top
C60 "10uF" 0603 47.344,36.5 r90 bottom
C61 "1uF" 0603 45.719,36.5 r90 bottom
C62 "0.1uF" 0603 30.25,40.722 r90 bottom
C63 "0.1uF" 0603 28.75,40.722 r90 bottom
C64 "10uF" 0603 47.125,44.5 r90 bottom
C65 "1uF" 0603 45.5,44.5 r90 bottom
C66 "0.1uF" 0603 36.625,51.5 r90 top
C67 "0.01uF" 0603 33.02,50 r270 bottom
C68 "10uF" 0603 47.125,41.25 r90 bottom
C69 "4.7uF" 0603 149.625,19.25 r90 bottom
C70 "10uF" 0603 152.625,6.375 r270 bottom
C71 "10uF" 0603 151.25,19.25 r90 bottom
C72 "0.1uF" 0603 148,19.25 r90 bottom
C73 "10uF" 0603 139.3,12.121 r90 bottom
C74 "10uF" 0603 137.649,12.121 r90 bottom
C75_BTN1 "0.01uF" 0805 21.75,8 r0 bottom (schematic designator C75)
C75_BTN21 "0.01uF" 0805 29.395,8 r0 bottom (schematic designator C75)
C75_BTN22 "0.01uF" 0805 36.895,8 r0 bottom (schematic designator C75)
C76 "1uF" 0603 45.5,41.25 r90 bottom
C77 "0.1uF" 0603 23,45 r180 bottom
C78 "0.1uF" 0603 31.125,46.875 r270 bottom
C79 "10uF" 0603 47.125,47.75 r90 bottom
C80 "1uF" 0603 45.5,47.75 r90 bottom
C81 "0.1uF" 0603 29.375,48.125 r90 bottom
C82 "1uF" 0603 148.81,61.029 r0 top
C83 "0.1uF" 0603 148.81,59.404 r0 top
D1 "ADV212BBCZ-150" "BGA-144 12x12" 124.756,36.514 r0 top
D2 "STM32F746VG6 (LQFP100)" LQFP-100 29.018,21.702 r270 top locked
D3 "ADV7180 (LQFP-64)" LQFP-64 29.128,45.744 r0 top locked
D4 "LM3671MF-3.3 (SOT23-5)" SOT-23-5 149.875,13.375 r180 bottom
D5 "ADP3338AKCZ-1.8-R7 (SOT-223)" SOT-223 143.75,12.125 r0 bottom
K1 "V23079A1001B301 TE" V23079A1001B301 61.5,54.625 r180 top
K2 "V23079A1001B301 TE" V23079A1001B301 96.875,31.75 r180 top
K3 "V23079A1001B301 TE" V23079A1001B301 61.375,43.125 r180 top
K4 "V23079A1001B301 TE" V23079A1001B301 96.75,43.25 r180 top
K5 "V23079A1001B301 TE" V23079A1001B301 61.375,31.625 r180 top
K6 "V23079A1001B301 TE" V23079A1001B301 79.25,31.625 r180 top
K7 "V23079A1001B301 TE" V23079A1001B301 79.25,20.125 r180 top
K8 "V23079A1001B301 TE" V23079A1001B301 79.059,43.123 r180 top
K9 "V23079A1001B301 TE" V23079A1001B301 79,54.625 r180 top
K10 "V23079A1001B301 TE" V23079A1001B301 96.875,20.125 r180 top
K11 "V23079A1001B301 TE" V23079A1001B301 96.625,54.625 r180 top
KP1 "Contact" Contact 16.895,36.5 r180 top
KP2 "Contact" Contact 16.895,34.5 r180 top
KP3 "Contact" Contact 16.895,32.5 r180 top
L1 "BLM18AG221SN1D (0603)" 0805 146.125,23 r180 top
L2 "BLM18AG221SN1D (0603)" 0805 50.344,31 r180 bottom
L3 "BLM18AG221SN1D (0603)" 0805 50.344,27.75 r180 bottom
L4 "BLM18AG221SN1D (0603)" 0805 50.344,34 r180 bottom
L5 "2.2uH" "SRN3015 (3x3x1.5)" 149.625,9.875 r0 bottom value={Value}
L6 "BLM18AG221SN1D (0603)" 0805 50.219,37.25 r180 bottom
L7 "BLM18AG221SN1D (0603)" 0805 50,45.25 r180 bottom
L8 "BLM18AG221SN1D (0603)" 0805 50,42 r180 bottom
L9 "BLM18AG221SN1D (0603)" 0805 50,48.375 r180 bottom
R1 "10k" 0603 113.5,31.875 r0 bottom
R2 "DNP" 0603 122,44.625 r270 bottom
R3 "10k" 0603 114.375,25 r45 bottom
R4 "DNP" 0603 120.5,44.625 r270 bottom
R5 "10k" 0603 116.625,32.625 r0 bottom
R6 "10k" 0603 116.625,31.125 r0 bottom
R7 "10k" 0603 119.875,25.5 r90 bottom
R8 "DNP" 0603 119,44.625 r270 bottom
R9 "10k" 0603 113.5,34.875 r0 bottom
R10 "10k" 0603 113.25,26.125 r45 bottom
R11 "DNP" 0603 121.375,47.75 r270 bottom
R12 "10k" 0603 113.5,33.375 r0 bottom
R13 "DNP" 0603 117.625,28.5 r90 bottom
R14 "DNP" 0603 114.375,48 r315 bottom
R15 "10k" 0603 138.875,32.875 r180 bottom
R16 "10k" 0603 122.125,28.5 r90 bottom
R17 "DNP" 0603 116.625,43.375 r0 bottom
R18 "10k" 0603 116.625,34.125 r0 bottom
R19 "10k" 0603 120.625,28.5 r90 bottom
R20 "DNP" 0603 113.25,46.875 r315 bottom
R21 "10k" 0603 113.5,36.375 r0 bottom
R22 "10k" 0603 119.125,28.5 r90 bottom
R23 "DNP" 0603 113.5,44 r0 bottom
R24 "10k" 0603 132.875,34.25 r180 bottom
R25 "10k" 0603 132.875,32.625 r180 bottom
R26 "DNP" 0603 116.625,41.875 r0 bottom
R27 "10k" 0603 135.875,33.5 r180 bottom
R28 "10k" 0603 134.875,30.75 r45 bottom
R29 "DNP" 0603 113.5,39.5 r0 bottom
R30 "10k" 0603 116.625,35.625 r0 bottom
R31 "10k" 0603 129,25.5 r90 bottom
R32 "DNP" 0603 113.5,42.5 r0 bottom
R33 "10k" 0603 132.875,35.75 r180 bottom
R34 "10k" 0603 127.375,25.5 r90 bottom
R35 "DNP" 0603 116.625,40.375 r0 bottom
R36 "10k" 0603 135.875,36.5 r180 bottom
R37 "DNP" 0603 122.875,47.75 r270 bottom
R38 "DNP" 0603 138.875,34.375 r180 bottom
R39 "DNP" 0603 113.5,41 r0 bottom
R40 "DNP" 0603 116.625,37.375 r0 bottom
R41 "DNP" 0603 116.625,38.875 r0 bottom
R42 "DNP" 0603 118.375,47.75 r270 bottom
R43 "DNP" 0603 121.375,25.5 r90 bottom
R44 "DNP" 0603 125.125,50.75 r270 bottom
R45 "10k" 0603 26,32.375 r90 bottom
R46 "10k" 0603 25.885,46.375 r0 bottom
R47 "10k" 0603 25.885,48 r0 bottom
R48 "4.7k" 0603 23.645,25.25 r0 bottom
R49 "36" 0603 50.694,68.44 r270 top
R50 "39" 0603 50.059,66.027 r0 top
R51 "36" 0603 10.76,68.44 r270 top
R52 "39" 0603 10.125,66.027 r180 top
R53 "36" 0603 30.826,68.313 r270 top
R54 "39" 0603 30.191,65.9 r180 top
R55 "1M" 0603 36.79,44.224 r270 top
R56 "1.69k" 0603 39.145,49.125 r0 top
R57 "0" 0603 41.519,49.875 r90 top
R58 "0" 0603 39.145,50.625 r0 top
R59 "33" 0603 19.75,50.75 r180 top
R60 "33" 0603 130.375,47.75 r270 bottom
R61 "33" 0603 136.25,47 r225 bottom
R62 "100" 0603 19.75,45.875 r180 top
R63 "0" 0603 20.49,41.402 r180 top
R64 "20k" 0603 33.02,46.875 r270 bottom
R65 "33" 0603 127.375,47.75 r270 bottom
R66 "33" 0603 132.875,39 r180 bottom
R67 "100" 0603 19.75,47.5 r180 top
R68 "0" 0603 132.875,37.5 r180 bottom
R69 "100" 0603 147.235,35.752 r0 top
R70 "33" 0603 125.875,47.75 r270 bottom
R71 "33" 0603 135.875,39.75 r180 bottom
R72 "33" 0603 29.385,37.25 r270 top
R73 "0" 0603 20.49,43.053 r180 top
R74 "4.7k" 0603 19.75,49.125 r180 top
R75 "33" 0603 132.875,42 r180 bottom
R76 "33" 0603 138.875,39.125 r180 bottom
R77 "33" 0603 18.77,18.75 r0 bottom
R78 "33" 0603 135.875,38.125 r180 bottom
R79 "33" 0603 135.25,48 r225 bottom
R80 "33" 0603 124.375,47.75 r270 bottom
R81 "33" 0603 18.77,17.25 r0 bottom
R82 "33" 0603 128.875,47.75 r270 bottom
R83 "33" 0603 119.875,47.75 r270 bottom
R84 "33" 0603 18.77,15.75 r0 bottom
R85 "33" 0603 132.875,40.5 r180 bottom
R86 "33" 0603 113.5,38 r0 bottom
R87 "33" 0603 18.77,14.25 r0 bottom
R88 "33" 0603 135.875,41.25 r180 bottom
R89 "33" 0603 135.875,35 r180 bottom
R90 "DNP" 0805 33.77,53.618 r180 top
R91 "0" 0805 37.25,57 r180 top
R92 "0" 0603 33.77,56.875 r180 top
R93 "DNP" 0603 33.77,55.375 r180 top
R94 "DNP" 0603 26.52,55.375 r180 top
R95 "0" 0805 29.875,56.875 r180 top
R96 "0" 0603 26.52,56.875 r180 top
R97 "DNP" 0805 26.461,53.618 r180 top
R98 "0" 0603 25.895,49.625 r180 bottom
R99 "0" 0805 19.125,56.875 r0 top
R100 "0" 0603 22.645,56.875 r0 top
R101 "DNP" 0603 22.645,55.375 r0 top
R102 "DNP" 0805 22.651,53.618 r0 top
R103 "33" 0603 98.81,36.576 r0 bottom
R104 "33" 0603 63.429,47.939 r0 bottom
R105 "33" 0603 98.685,47.997 r0 bottom
R106 "33" 0603 63.425,36.463 r0 bottom
R107 "33" 0603 63.427,59.369 r0 bottom
R108 "33" 0603 81.177,36.395 r0 bottom
R109 "33" 0603 63.427,49.869 r0 bottom
R110 "33" 0603 98.81,26.951 r0 bottom
R111 "33" 0603 63.429,38.314 r0 bottom
R112 "33" 0603 98.81,38.497 r0 bottom
R113 "33" 0603 61.875,26.875 r180 bottom
R114 "33" 0603 81.302,26.895 r0 bottom
R115 "4.7k" 0805 55.404,56.53 r90 bottom
R116 "4.7k" 0805 90.779,33.655 r90 bottom
R117 "4.7k" 0805 55.279,45.03 r90 bottom
R118 "4.7k" 0805 90.654,45.155 r90 bottom
R119 "4.7k" 0805 55.279,33.53 r90 bottom
R120 "4.7k" 0805 73.027,33.403 r90 bottom
R121 "20k" 0805 55.404,52.72 r90 bottom
R122 "20k" 0805 90.779,29.845 r90 bottom
R123 "20k" 0805 55.279,41.22 r90 bottom
R124 "20k" 0805 90.654,41.345 r90 bottom
R125 "20k" 0805 55.279,29.72 r90 bottom
R126 "20k" 0805 73.027,29.72 r90 bottom
R127 "33" 0603 81.304,24.984 r0 bottom
R128 "33" 0603 81.115,47.933 r0 bottom
R129 "33" 0603 80.905,59.578 r0 bottom
R130 "33" 0603 98.855,25.072 r0 bottom
R131 "10k" 0603 95.807,25.072 r0 bottom
R132 "10k" 0603 77.308,59.554 r0 bottom
R133 "33" 0603 81.115,38.308 r0 bottom
R134 "33" 0603 81.304,15.359 r0 bottom
R135 "33" 0603 81.032,49.799 r0 bottom
R136 "33" 0603 98.855,15.42 r0 bottom
R137 "10k" 0603 77.349,49.799 r0 bottom
R138 "10k" 0603 95.553,15.42 r0 bottom
R139 "4.7k" 0805 73.027,22.03 r90 bottom
R140 "4.7k" 0805 72.836,45.028 r90 bottom
R141 "4.7k" 0805 72.904,56.53 r90 bottom
R142 "4.7k" 0805 90.779,22.03 r90 bottom
R143 "20k" 0805 73.027,18.22 r90 bottom
R144 "20k" 0805 72.836,41.218 r90 bottom
R145 "20k" 0805 72.904,52.72 r90 bottom
R146 "20k" 0805 90.779,18.22 r90 bottom
R147_BTN1 "10k" 0805 21.77,6 r0 bottom (schematic designator R147)
R147_BTN21 "10k" 0805 29.395,6 r0 bottom (schematic designator R147)
R147_BTN22 "10k" 0805 36.895,6 r0 bottom (schematic designator R147)
R148_BTN1 "4.7k" 0805 25.52,6 r180 bottom (schematic designator R148)
R148_BTN21 "4.7k" 0805 33.145,6 r180 bottom (schematic designator R148)
R148_BTN22 "4.7k" 0805 40.645,6 r180 bottom (schematic designator R148)
R149_BTN1 "20k" 0805 25.52,8 r0 bottom (schematic designator R149)
R149_BTN21 "20k" 0805 33.145,8 r0 bottom (schematic designator R149)
R149_BTN22 "20k" 0805 40.645,8 r0 bottom (schematic designator R149)
R150 "4.7k" 0805 90.402,56.53 r90 bottom
R151 "20k" 0805 90.402,52.847 r90 bottom
R152 "10k" 0603 129.625,28.5 r90 bottom
R153 "20k" 0603 25.895,41.875 r0 bottom
R154 "100" 0603 23.875,37.125 r90 top
R155 "1k" 0603 56.125,59.375 r0 bottom
R156 "1k" 0603 91.5,36.375 r0 bottom
R157 "1k" 0603 56.125,47.875 r0 bottom
R158 "1k" 0603 91.375,48 r0 bottom
R159 "1k" 0603 56,36.125 r0 bottom
R160 "1k" 0603 73.875,36.25 r0 bottom
R161 "1k" 0603 73.875,24.75 r0 bottom
R162 "1k" 0603 73.625,48 r0 bottom
R163 "1k" 0603 73.5,59.25 r0 bottom
R164 "1k" 0603 91.5,24.625 r0 bottom
R165 "1k" 0603 91.125,59.25 r0 bottom
R166 "1k" 0603 41.375,20.375 r0 bottom
R167 "1k" 0603 41.375,18.25 r0 bottom
R168 "1k" 0603 41.375,16.125 r0 bottom
R169 "0" 0603 151.25,53.75 r90 top
R170 "0" 0603 150.5,51.375 r180 top
R171 "1k" 0603 149.875,16.25 r0 bottom
R172 "0" 0603 145.625,62.75 r0 top
SA1 "DIP переключатель 2 поз" DMHA-02G 149.375,43.25 r270 top
SA2_BTN1 "KLS7-TS3401" KLS7-TS3401 21.645,8.125 r0 top (schematic designator SA2)
SA2_BTN21 "KLS7-TS3401" KLS7-TS3401 29.27,8.125 r0 top (schematic designator SA2)
SA2_BTN22 "KLS7-TS3401" KLS7-TS3401 36.77,8.125 r0 top (schematic designator SA2)
VD1 "LED(0805)" 0805(LED) 56.125,59.375 r180 top
VD2 "LED(0805)" 0805(LED) 91.5,36.375 r180 top
VD3 "LED(0805)" 0805(LED) 56,47.875 r180 top
VD4 "LED(0805)" 0805(LED) 91.279,47.873 r180 top
VD5 "LED(0805)" 0805(LED) 41.5,20.375 r180 top
VD6 "LED(0805)" 0805(LED) 56,36.125 r180 top
VD7 "LED(0805)" 0805(LED) 41.5,18.25 r180 top
VD8 "LED(0805)" 0805(LED) 73.875,36.25 r180 top
VD9 "LED(0805)" 0805(LED) 41.5,16.125 r180 top
VD10 "LED(0805)" 0805(LED) 73.875,24.75 r180 top
VD11 "LED(0805)" 0805(LED) 73.625,47.875 r180 top
VD12 "LED(0805)" 0805(LED) 73.625,59.25 r180 top
VD13 "LED(0805)" 0805(LED) 91.5,24.75 r180 top
VD14 "LED(0805)" 0805(LED) 91.25,59.25 r180 top
VD15 "LL4148 NXP" SOD80C 70.263,54.752 r90 bottom
VD16 "LL4148 NXP" SOD80C 105.638,31.75 r90 bottom
VD17 "LL4148 NXP" SOD80C 70.138,43.125 r90 bottom
VD18 "LL4148 NXP" SOD80C 105.64,43.377 r90 bottom
VD19 "LL4148 NXP" SOD80C 70.138,31.625 r90 bottom
VD20 "LL4148 NXP" SOD80C 88.013,31.879 r90 bottom
VD21 "LL4148 NXP" SOD80C 105.388,54.625 r90 bottom
VD28 "LL4148 NXP" SOD80C 88.013,20.252 r90 bottom
VD29 "LL4148 NXP" SOD80C 87.949,43.25 r90 bottom
VD30 "LL4148 NXP" SOD80C 87.763,54.752 r90 bottom
VD31 "LL4148 NXP" SOD80C 105.638,20.125 r90 bottom
VD35 "BAT60JFILM (SOD323)" SOD323 149.625,7.125 r0 bottom
VD36 "BAT60JFILM (SOD323)" SOD323 149.625,5.125 r0 bottom
VT1 "MMBT5551L" SOT-23 65.691,54.625 r90 bottom
VT2 "MMBT5551L" SOT-23 100.685,31.75 r90 bottom
VT3 "MMBT5551L" SOT-23 65.439,43.125 r90 bottom
VT4 "MMBT5551L" SOT-23 100.687,43.377 r90 bottom
VT5 "MMBT5551L" SOT-23 65.566,31.752 r90 bottom
VT6 "MMBT5551L" SOT-23 83.314,31.625 r90 bottom
VT7 "MMBT5551L" SOT-23 83.06,20.125 r90 bottom
VT8 "MMBT5551L" SOT-23 83.25,43.25 r90 bottom
VT9 "MMBT5551L" SOT-23 83.191,54.752 r90 bottom
VT10 "MMBT5551L" SOT-23 100.939,20.125 r90 bottom
VT11_BTN1 "MMBT5551L" SOT-23 25.52,10.75 r180 bottom (schematic designator VT11)
VT11_BTN21 "MMBT5551L" SOT-23 33.145,10.875 r180 bottom (schematic designator VT11)
VT11_BTN22 "MMBT5551L" SOT-23 40.645,10.75 r180 bottom (schematic designator VT11)
VT12 "MMBT5551L" SOT-23 100.562,54.625 r90 bottom
X1 "Коннектор \"Тюльпан\"" NYS-354 50.75,72.25 r0 top
X2 "DS1073-01-2x1-MRT6 (2pin)" "DS1073-01-2x1-MRT6 (2 pin)" 132.125,67.5 r180 top locked
X3 "Коннектор \"Тюльпан\"" NYS-354 10.75,72.25 r0 top
X4 "Коннектор \"Тюльпан\"" NYS-354 30.75,72.25 r0 top
X5 "FORMULA" FORMULA 108.246,33.212 r0 top locked
X6 "PLS6-2,54" PLS6-2,54 10.875,29.25 r270 top
ZQ1 "27MHz" "SOC3 SMD" 146.854,32.704 r180 top
ZQ2 "16 MHz" HC-49SM 17.651,22.067 r270 top
ZQ3 "28.63636 MHz" ABM3 39.385,44.25 r270 top

## Footprints (in the part's own frame and the unit in brackets; to place one, negate y for a bottom-side part, rotate by r counter-clockwise, add the part's x,y. Pads: shape width x height; smd on the part's side, far side on the other; paste and mask are expansions set on the pad)
0603 [mm]
  rect 0.9x1 smd: 1(-0.76,0) 2(0.76,0)
  silkscreen extent -1.53,-0.82 1.53,0.82, body extent -0.8,-0.4 0.8,0.4, height 0.45
0805 [mm]
  rect 1.2x1.3 smd: 1(-0.95,0) 2(0.95,0)
  silkscreen extent -1.87,-0.97 1.87,0.97, body extent -1.05,-0.63 0.95,0.63, height 0.55
0805(LED) [mm]
  rect 1.2x1.3 smd: 1(-0.95,0) 2(0.95,0)
  silkscreen extent -1.87,-0.97 1.87,0.97, body extent -1.03,-0.41 1.03,0.5, height 0.85
ABM3 [mm]
  rrect50% 2.4x2.4 smd: 1(-2.35,0) 2(2.35,0)
  silkscreen extent -2.5,-1.6 2.5,1.6
"BGA-144 12x12" [mm]
  round 0 hole 2.65 unplated: 5(-15,-14) 5(-15,14) 5(15,-14) 5(15,14)
  round 0 hole 1.45 unplated: 5(-11.5,-7.55)
  round 0 hole 1.95 unplated: 5(11.05,7.55)
  round 0.6 smd mask+0.1: A1(-5.5,5.5) A2(-4.5,5.5) A3(-3.5,5.5) A4(-2.5,5.5) A5(-1.5,5.5) A6(-0.5,5.5) A7(0.5,5.5) A8(1.5,5.5) A9(2.5,5.5) A10(3.5,5.5) A11(4.5,5.5) A12(5.5,5.5) B1(-5.5,4.5) B2(-4.5,4.5) B3(-3.5,4.5) B4(-2.5,4.5) B5(-1.5,4.5) B6(-0.5,4.5) B7(0.5,4.5) B8(1.5,4.5) B9(2.5,4.5) B10(3.5,4.5) B11(4.5,4.5) B12(5.5,4.5) C1(-5.5,3.5) C2(-4.5,3.5) C3(-3.5,3.5) C4(-2.5,3.5) C5(-1.5,3.5) C6(-0.5,3.5) C7(0.5,3.5) C8(1.5,3.5) C9(2.5,3.5) C10(3.5,3.5) C11(4.5,3.5) C12(5.5,3.5) D1(-5.5,2.5) D2(-4.5,2.5) D3(-3.5,2.5) D4(-2.5,2.5) D5(-1.5,2.5) D6(-0.5,2.5) D7(0.5,2.5) D8(1.5,2.5) D9(2.5,2.5) D10(3.5,2.5) D11(4.5,2.5) D12(5.5,2.5) E1(-5.5,1.5) E2(-4.5,1.5) E3(-3.5,1.5) E4(-2.5,1.5) E5(-1.5,1.5) E6(-0.5,1.5) E7(0.5,1.5) E8(1.5,1.5) E9(2.5,1.5) E10(3.5,1.5) E11(4.5,1.5) E12(5.5,1.5) F1(-5.5,0.5) F2(-4.5,0.5) F3(-3.5,0.5) F4(-2.5,0.5) F5(-1.5,0.5) F6(-0.5,0.5) F7(0.5,0.5) F8(1.5,0.5) F9(2.5,0.5) F10(3.5,0.5) F11(4.5,0.5) F12(5.5,0.5) G1(-5.5,-0.5) G2(-4.5,-0.5) G3(-3.5,-0.5) G4(-2.5,-0.5) G5(-1.5,-0.5) G6(-0.5,-0.5) G7(0.5,-0.5) G8(1.5,-0.5) G9(2.5,-0.5) G10(3.5,-0.5) G11(4.5,-0.5) G12(5.5,-0.5) H1(-5.5,-1.5) H2(-4.5,-1.5) H3(-3.5,-1.5) H4(-2.5,-1.5) H5(-1.5,-1.5) H6(-0.5,-1.5) H7(0.5,-1.5) H8(1.5,-1.5) H9(2.5,-1.5) H10(3.5,-1.5) H11(4.5,-1.5) H12(5.5,-1.5) J1(-5.5,-2.5) J2(-4.5,-2.5) J3(-3.5,-2.5) J4(-2.5,-2.5) J5(-1.5,-2.5) J6(-0.5,-2.5) J7(0.5,-2.5) J8(1.5,-2.5) J9(2.5,-2.5) J10(3.5,-2.5) J11(4.5,-2.5) J12(5.5,-2.5) K1(-5.5,-3.5) K2(-4.5,-3.5) K3(-3.5,-3.5) K4(-2.5,-3.5) K5(-1.5,-3.5) K6(-0.5,-3.5) K7(0.5,-3.5) K8(1.5,-3.5) K9(2.5,-3.5) K10(3.5,-3.5) K11(4.5,-3.5) K12(5.5,-3.5) L1(-5.5,-4.5) L2(-4.5,-4.5) L3(-3.5,-4.5) L4(-2.5,-4.5) L5(-1.5,-4.5) L6(-0.5,-4.5) L7(0.5,-4.5) L8(1.5,-4.5) L9(2.5,-4.5) L10(3.5,-4.5) L11(4.5,-4.5) L12(5.5,-4.5) M1(-5.5,-5.5) M2(-4.5,-5.5) M3(-3.5,-5.5) M4(-2.5,-5.5) M5(-1.5,-5.5) M6(-0.5,-5.5) M7(0.5,-5.5) M8(1.5,-5.5) M9(2.5,-5.5) M10(3.5,-5.5) M11(4.5,-5.5) M12(5.5,-5.5)
  silkscreen extent -17.5,-25 17.5,22.5, body extent -10,-25 10,-22.5, height 34
Contact [mm]
  oval 2x1 smd: 1(0,0)
DMHA-02G [mm]
  oval 2.2x1.1 smd: 1(-4.4,1.27) 2(4.4,1.27) 3(-4.4,-1.27) 4(4.4,-1.27)
  silkscreen extent -5.5,-2.54 5.5,2.54
"DS1073-01-2x1-MRT6 (2 pin)" [mm]
  round 2.2 hole 1.5: 1(0,0) 2(0,5.5)
  round 0 hole 2.4 unplated: ""(-4.6,-4.2) ""(4.6,-4.2)
  silkscreen extent -9.85,-14 9.85,5.5
FORMULA [mm]
  rect 1.8x1.8 hole 1: 1(12.18,29.22) VDDF(12.18,-26.68) VEEF(45.2,22.86)
  round 1.8 hole 1: 2(9.64,29.22) 3(7.1,29.22) 4(4.56,29.22) 5(2.02,29.22) 6(-0.52,29.22) 7(-3.06,29.22) 8(-5.6,29.22) 9(-8.14,29.22) 10(-10.68,29.22) 11(-13.22,29.22) 12(-15.76,29.22) 13(-18.3,29.22) 14(-20.84,29.22) 15(-23.38,29.22) 16(-25.92,29.22) 17(12.18,31.76) 18(9.64,31.76) 19(7.1,31.76) 20(4.56,31.76) 21(2.02,31.76) 22(-0.52,31.76) 23(-3.06,31.76) 24(-5.6,31.76) 25(-8.14,31.76) 26(-10.68,31.76) 27(-13.22,31.76) 28(-15.76,31.76) 29(-18.3,31.76) 30(-20.84,31.76) 31(-23.38,31.76) 32(-25.92,31.76) 33(-28.46,-29.22) 34(-25.92,-29.22) 35(-23.38,-29.22) 36(-20.84,-29.22) 37(-18.3,-29.22) 38(-15.76,-29.22) 39(-13.22,-29.22) 40(-10.68,-29.22) 41(-8.14,-29.22) 42(-5.6,-29.22) 43(-3.06,-29.22) 44(-0.52,-29.22) 45(2.02,-29.22) 46(4.56,-29.22) 47(7.1,-29.22) 48(9.64,-29.22) 49(-28.46,-26.68) 50(-25.92,-26.68) 51(-23.38,-26.68) 52(-20.84,-26.68) 53(-18.3,-26.68) 54(-15.76,-26.68) 55(-13.22,-26.68) 56(-10.68,-26.68) 57(-8.14,-26.68) 58(-5.6,-26.68) 59(-3.06,-26.68) 60(-0.52,-26.68) 61(2.02,-26.68) 62(4.56,-26.68) 63(7.1,-26.68) 64(9.64,-26.68) +5V(45.2,-15.24) +5V(47.74,-15.24) +5V_VCCF(45.2,20.32) +5V_VCCS(47.74,20.32) +5V_VDDF(45.2,17.78) +5V_VDDS(47.74,17.78) +12V(45.2,-12.7) +12V(47.74,-12.7) -12V(45.2,-17.78) -12V(47.74,-17.78) GND(-28.46,29.22) GND(-28.46,31.76) GND(45.2,-10.16) GND(45.2,15.24) GND(47.74,-10.16) GND(47.74,15.24) IN-OUT1(47.74,10.16) IN-OUT2(47.74,7.62) IN-OUT3(47.74,5.08) IN-OUT4(47.74,2.54) IN-OUT5(47.74,0) IN-OUT6(47.74,-2.54) IN-OUT7(47.74,-5.08) IN-OUT8(47.74,-7.62) NC(45.2,12.7) NC(47.74,12.7) OUT1(45.2,10.16) OUT2(45.2,7.62) OUT3(45.2,5.08) OUT4(45.2,2.54) OUT5(45.2,0) OUT6(45.2,-2.54) OUT7(45.2,-5.08) OUT8(45.2,-7.62) VDDS(12.18,-29.22) VEES(47.74,22.86)
  silkscreen extent -29.8,-30.51 49.02,32.97, body extent -29.79,-30.4 48.98,32.92, height 3
HC-49SM [mm] "HC-49SM"
  rect 4x1.2 smd: 1(-4.5,0) 2(4.5,0)
  silkscreen extent -5.7,-2.25 5.7,2.25
KLS7-TS3401 [mm]
  rect 0.7x1.5 smd: 1(1.075,2.025) 2(-1.075,2.025) 3(-1.075,-2.025) 4(1.075,-2.025)
  silkscreen extent -1.79,-2.1 1.78,2.1
LQFP-64 [mm]
  rrect50% 0.3x1.5 smd: 1(-3.75,-5.75) 2(-3.25,-5.75) 3(-2.75,-5.75) 4(-2.25,-5.75) 5(-1.75,-5.75) 6(-1.25,-5.75) 7(-0.75,-5.75) 8(-0.25,-5.75) 9(0.25,-5.75) 10(0.75,-5.75) 11(1.25,-5.75) 12(1.75,-5.75) 13(2.25,-5.75) 14(2.75,-5.75) 15(3.25,-5.75) 16(3.75,-5.75) 33(3.75,5.75) 34(3.25,5.75) 35(2.75,5.75) 36(2.25,5.75) 37(1.75,5.75) 38(1.25,5.75) 39(0.75,5.75) 40(0.25,5.75) 41(-0.25,5.75) 42(-0.75,5.75) 43(-1.25,5.75) 44(-1.75,5.75) 45(-2.25,5.75) 46(-2.75,5.75) 47(-3.25,5.75) 48(-3.75,5.75)
  rrect50% 1.5x0.3 smd: 17(5.75,-3.75) 18(5.75,-3.25) 19(5.75,-2.75) 20(5.75,-2.25) 21(5.75,-1.75) 22(5.75,-1.25) 23(5.75,-0.75) 24(5.75,-0.25) 25(5.75,0.25) 26(5.75,0.75) 27(5.75,1.25) 28(5.75,1.75) 29(5.75,2.25) 30(5.75,2.75) 31(5.75,3.25) 32(5.75,3.75) 49(-5.75,3.75) 50(-5.75,3.25) 51(-5.75,2.75) 52(-5.75,2.25) 53(-5.75,1.75) 54(-5.75,1.25) 55(-5.75,0.75) 56(-5.75,0.25) 57(-5.75,-0.25) 58(-5.75,-0.75) 59(-5.75,-1.25) 60(-5.75,-1.75) 61(-5.75,-2.25) 62(-5.75,-2.75) 63(-5.75,-3.25) 64(-5.75,-3.75)
  silkscreen extent -6.85,-6.75 6.6,6.5
LQFP-100 [mm]
  rect 0.3x1.2 smd: 1(-6,-7.75) 2(-5.5,-7.75) 3(-5,-7.75) 4(-4.5,-7.75) 5(-4,-7.75) 6(-3.5,-7.75) 7(-3,-7.75) 8(-2.5,-7.75) 9(-2,-7.75) 10(-1.5,-7.75) 11(-1,-7.75) 12(-0.5,-7.75) 13(0,-7.75) 14(0.5,-7.75) 15(1,-7.75) 16(1.5,-7.75) 17(2,-7.75) 18(2.5,-7.75) 19(3,-7.75) 20(3.5,-7.75) 21(4,-7.75) 22(4.5,-7.75) 23(5,-7.75) 24(5.5,-7.75) 25(6,-7.75) 51(6,7.75) 52(5.5,7.75) 53(5,7.75) 54(4.5,7.75) 55(4,7.75) 56(3.5,7.75) 57(3,7.75) 58(2.5,7.75) 59(2,7.75) 60(1.5,7.75) 61(1,7.75) 62(0.5,7.75) 63(0,7.75) 64(-0.5,7.75) 65(-1,7.75) 66(-1.5,7.75) 67(-2,7.75) 68(-2.5,7.75) 69(-3,7.75) 70(-3.5,7.75) 71(-4,7.75) 72(-4.5,7.75) 73(-5,7.75) 74(-5.5,7.75) 75(-6,7.75)
  rect 1.2x0.3 smd: 26(7.75,-6) 27(7.75,-5.5) 28(7.75,-5) 29(7.75,-4.5) 30(7.75,-4) 31(7.75,-3.5) 32(7.75,-3) 33(7.75,-2.5) 34(7.75,-2) 35(7.75,-1.5) 36(7.75,-1) 37(7.75,-0.5) 38(7.75,0) 39(7.75,0.5) 40(7.75,1) 41(7.75,1.5) 42(7.75,2) 43(7.75,2.5) 44(7.75,3) 45(7.75,3.5) 46(7.75,4) 47(7.75,4.5) 48(7.75,5) 49(7.75,5.5) 50(7.75,6) 76(-7.75,6) 77(-7.75,5.5) 78(-7.75,5) 79(-7.75,4.5) 80(-7.75,4) 81(-7.75,3.5) 82(-7.75,3) 83(-7.75,2.5) 84(-7.75,2) 85(-7.75,1.5) 86(-7.75,1) 87(-7.75,0.5) 88(-7.75,0) 89(-7.75,-0.5) 90(-7.75,-1) 91(-7.75,-1.5) 92(-7.75,-2) 93(-7.75,-2.5) 94(-7.75,-3) 95(-7.75,-3.5) 96(-7.75,-4) 97(-7.75,-4.5) 98(-7.75,-5) 99(-7.75,-5.5) 100(-7.75,-6)
  silkscreen extent -8.75,-8.75 9.1,8.85
NYS-354 [mm]
  round 3 hole 1.5: 1(0,0)
  round 5.6 hole 2.8: 2(-5.25,0) 2(0,5.5) 2(5.25,0)
PLS6-2,54 [mm]
  rect 1.8x1.8 hole 1: 1(0,-0.01)
  round 1.8 hole 1: 2(2.54,-0.01) 3(5.08,-0.01) 4(7.62,-0.01) 5(10.16,-0.01) 6(12.7,-0.01)
  silkscreen extent -1.27,-1.28 13.97,1.26, body extent -1.27,-1.28 13.97,1.26, height 8.54
"SOC3 SMD" [mm]
  rect 1.2x0.95 smd: 1(-1.1,-0.875)
  rrect50% 1.2x0.95 smd: 2(1.1,-0.875) 3(1.1,0.875) 4(-1.1,0.875)
  silkscreen extent -2.35,-2 2.35,2
SOD80C [mm]
  rrect50% 1.1x1.7 smd: 1(-1.9,0)
  rect 1.1x1.7 smd: 2(1.9,0)
  silkscreen extent -1.85,-1.17 1.85,1.17, body extent -1.9,-0.8 1.8,0.8, height 1.55
SOD323 [mm]
  rect 1x0.8 smd: 1(1.2,0)
  rrect50% 1x0.8 smd: 2(-1.2,0)
  silkscreen extent -0.9,-0.84 0.9,0.84, body extent -1.41,-0.67 1.19,0.67, height 1.1
SOT-23 [mm]
  rect 0.8x0.9 smd: 1(-0.95,-1) 1(-0.95,-1) 2(0.95,-1) 2(0.95,-1) 3(0,1) 3(0,1)
  silkscreen extent -1.55,-0.72 1.55,0.7, body extent -1.5,-1.25 1.5,1.25, height 1.05
SOT-23-5 [mm]
  rrect50% 0.7x1.1 smd mask+0.1: 1(0.95,1.2)
  rect 0.7x1.1 smd mask+0.1: 2(0,1.2) 3(-0.95,1.2)
  rect 0.7x1 smd mask+0.1: 4(-0.95,-1.2) 5(0.95,-1.2)
  silkscreen extent -1.62,-0.88 1.62,0.88
SOT-223 [mm]
  rect 1.5x2 smd: 1(-2.3,-3.15) 2(0,-3.15) 3(2.3,-3.15)
  rect 3.8x2 smd: 2(0,3.15)
  silkscreen extent -3.35,-1.79 3.35,1.81
"SRN3015 (3x3x1.5)" [mm]
  rect 1.2x2.7 smd: 1(-1.2,0) 2(1.2,0)
  silkscreen extent -1.5,-1.55 1.5,1.55
V23079A1001B301 [mm]
  rect 1.4x1.4 hole 0.8: 1(-6.3,-2.54)
  round 1.4 hole 0.8: 3(-1.22,-2.54) 4(1.32,-2.54) 5(3.86,-2.54) 8(3.86,2.54) 9(1.32,2.54) 10(-1.22,2.54) 12(-6.3,2.54)
  silkscreen extent -7.4,-3.63 7.25,3.63, body extent -7.25,-3.6 7.25,3.6, height 9.4

## Part data
C1 C2 C3 C4 C5 C6 C7 C8 C9 C10 C11 C12 C13 C14 C15 C16 C17 C18 C19 C20 C21 C22 C23 C24 C25 C26 C27 C28 C29 C30 C31 C32 C33 C34 C35 C36 C37 C38 C39 C40 C41 C42 C43 C44 C45 C46 C47 C48 C49 C50 C51 C52 C53 C54 C55 C56 C57 C58 C59 C60 C61 C62 C63 C64 C65 C66 C67 C68 C76 C77 C78 C79 C80 C81 C82 C83: library part C0603, ComponentHeigt=1.3, Firme=AVX, KIND=Конденсатор, Leadform=SMD, Packaging=0805
C69: library part C0603, "4.7uF,16V (0603)", ComponentHeigt=1.3, Firme=AVX, KIND=Конденсатор, Leadform=SMD, Packaging=0805
C70 C71 C74: library part C0603, "10uF,16V (0603)", ComponentHeigt=1.3, Firme=AVX, KIND=Конденсатор, Leadform=SMD, Packaging=0805
C72 C73: library part C0603, "0.1uF,50V (0603)", ComponentHeigt=1.3, Firme=AVX, KIND=Конденсатор, Leadform=SMD, Packaging=0805
C75_BTN1 C75_BTN21 C75_BTN22: library part C0805, ComponentHeigt=1.3, Firme=AVX, KIND=Конденсатор, Leadform=SMD, Packaging=0805
D2: library part STM32F746VG6
D4: library part "LM3671MF (SOT23-5)", ComponentHeigt=1.8, Firme=Linear, KIND=Микросхема, Leadform=формована, Packaging=SOT-223
D5: library part "ADP3338 (SOT-223)", ComponentHeigt=1.8, Firme=Linear, KIND=Микросхема, Leadform=формована, Packaging=SOT-223
L1 L2 L3 L4 L6 L7 L8 L9: library part "BLM21(0805) Murata", ComponentHeigt=1.1, Firme=Murata, Leadform=SMD, Packaging=1206
L5: library part "SRN3015 (3x3x1.5)", "SRN3015-2R2M (2.2uH,1A)", ComponentHeigt=3.2, Firm=TDK, KIND="Катушка индуктивности B82432T TDK", Name="Катушка индуктивности", Packaging="SIMIT 1812-T", Typ=B82432T
R1 R2 R3 R4 R5 R6 R7 R8 R9 R10 R11 R12 R13 R14 R15 R16 R17 R18 R19 R20 R21 R22 R23 R24 R25 R26 R27 R28 R29 R30 R31 R32 R33 R34 R35 R36 R37 R38 R39 R40 R41 R42 R43 R44 R45 R46 R47 R48 R49 R50 R51 R52 R53 R54 R55 R56 R57 R58 R59 R60 R61 R62 R63 R64 R65 R66 R67 R68 R69 R70 R71 R72 R73 R74 R75 R76 R77 R78 R79 R80 R81 R82 R83 R84 R85 R86 R87 R88 R89 R92 R93 R94 R96 R98 R100 R101 R103 R104 R105 R106 R107 R108 R109 R110 R111 R112 R113 R114 R127 R128 R129 R130 R131 R132 R133 R134 R135 R136 R137 R138 R152 R153 R154 R155 R156 R157 R158 R159 R160 R161 R162 R163 R164 R165 R166 R167 R168 R169 R170 R171 R172: library part "R0603 Yageo", ComponentHeigt=0.5, Firme=Yageo, KIND=Резистор, Leadform=SMD, Packaging=0402
R90 R91 R95 R97 R99 R102 R115 R116 R117 R118 R119 R120 R121 R122 R123 R124 R125 R126 R139 R140 R141 R142 R143 R144 R145 R146 R147_BTN1 R147_BTN21 R147_BTN22 R148_BTN1 R148_BTN21 R148_BTN22 R149_BTN1 R149_BTN21 R149_BTN22 R150 R151: library part "R0805 Yageo", ComponentHeigt=0.6, Firme=Yageo, KIND=Резистор, Leadform=SMD, Packaging=0805
SA1: library part DMHA-02G-G
X1: library part NYS-354, "Y"
X3: library part NYS-354, "Cb"
X4: library part NYS-354, "Cr"
ZQ1: library part "SOC3 SMD OSC", "TTL CMOS 3.3V 27 MHz"
ZQ2: library part HC-49SM, "HC-49SM"
ZQ3: library part ABM3, "ABM3-28.63636MHZ"
SA2_BTN1 SA2_BTN21 SA2_BTN22: Component Heigt=7, Firme=TYCO, KIND="Кнопка 1-1977223-9 Tyco", Leadform=SMD, NN=25100175
VD1 VD2 VD3 VD4 VD5 VD6 VD7 VD8 VD9 VD10 VD11 VD12 VD13 VD14 VD35 VD36: ComponentHeigt=0.75, Firme=Kingbright, KIND="Светодиод L-1154GD Kingbright", Leadform="в отверстия", NN=24003000
VD15 VD16 VD17 VD18 VD19 VD20 VD21 VD28 VD29 VD30 VD31: Component Link=http://www.nxp.com, ComponentHeigt=1.6, Firme=NXP, KIND="Диод LL4148 NXP", Leadform=SMD, NN=24009301, Packaging=SOD-80C
VT1 VT2 VT3 VT4 VT5 VT6 VT7 VT8 VT9 VT10 VT11_BTN1 VT11_BTN21 VT11_BTN22 VT12: ComponentHeigt=1.1, Firme=ONS, KIND="Транзистор MMBT5551L*G ONS", Leadform=SMD, NN=24007468, Packaging=SOT-23
X2 X6: ComponentHeigt=5.5, Name=Вилка, Specification="Вилка PLD2-2 *", Typ=PLD2-2

## Via types
v1: diameter 0.5, hole 0.2, Top Layer 1 to Bottom Layer, tented both sides, 605 vias
v2: diameter 0.6, hole 0.3, Top Layer 1 to Bottom Layer, tented bottom, 6 vias
v3: diameter 0.6, hole 0.3, Top Layer 1 to Bottom Layer, tented both sides, 3 vias

## Nets (pads, with @x,y where several pads share a name; then routed paths per layer and width w, separated by ;. In a path a pad name is that pad's centre, name@x,y a point inside that pad or via, vN(x,y) a via of type N, cw(c..) or ccw(c..) an arc to the next point about the centre after c; other vN are vias at no path point)
+1.5V: C2.1 C14.1 C15.1 C16.1 C17.1 C18.1 C19.1 C20.1 C21.1 C22.1 C23.1 C24.1 C25.1 C26.1 C27.1 C58.1 C82.1 C83.1 D1.B6 D1.B7 D1.C6 D1.C7 D1.D6 D1.D7 D1.J6 D1.J7 D1.K6 D1.K7 D1.L6 D1.L7 D1.M10 R169.2 R172.2 | length 48.2
  Top Layer 1 w0.3: v1@123.752,41.51 v1(123.755,41.51) ; v1@123.755,39.505 v1(123.759,39.505) ; v1(123.755,40.515) D1.C6@124.256,40.014 ; v1(123.755,41.51) 124.252,41.014 D1.B6@124.256,41.014 ; v1(123.759,31.512) 123.759,31.514 124.256,32.011 D1.L6@124.256,32.014 ; v1(123.759,32.514) 123.759,32.516 124.256,33.012 D1.K6@124.256,33.014 ; v1@123.759,33.516 D1.J6@124.256,34.013 ; v1(123.759,39.505) 124.251,39.014 D1.D6@124.256,39.014 ; D1.L7@125.256,32.014 125.256,32.01 125.751,31.515 v1(125.751,31.512) ; D1.K7@125.256,33.014 125.256,33.011 125.751,32.516 v1(125.751,32.514) ; D1.J7@125.256,34.014 125.256,34.012 125.751,33.517 v1(125.751,33.515) ; D1.D7@125.256,39.014 125.259,39.014 125.759,39.514 v1(125.762,39.514) ; D1.C7@125.256,40.014 v1@125.754,40.513 ; D1.B7@125.256,41.014 125.259,41.014 v1(125.754,41.51) v1@125.758,41.51 ; D1.M10@128.256,31.014 128.761,30.509 v1(128.761,30.448)
  Top Layer 1 w1: v1@144.529,59.404 v1(144.711,59.404) v1(145.579,59.404) v1(146.497,59.404) C83.1@148.05,59.404 C82.1@148.05,61.029 C2.1@148.05,62.654 147.954,62.75 R172.2@146.5,62.75 ; v1(144.885,56.24) v1(145.908,56.24) v1(146.842,56.24) v1(147.913,56.24) C15.1@149.5,56.24 C14.1@151.25,56.24 R169.2@151.25,54.51
  Bottom Layer w0.8: C16.1@120.625,51.51 v1(120.625,52.75) ; C17.1@122.125,51.51 v1(122.125,52.75) ; v1(122.875,22.875) v1(122.875,23.625) C58.1@122.875,24.74 ; C18.1@123.625,51.51 v1(123.625,52.75) ; v1(124.375,22.875) v1(124.375,23.619) C27.1@124.375,24.74 ; v1(125.875,22.875) v1(125.875,23.614) C25.1@125.875,24.74 ; C19.1@126.75,51.51 v1(126.75,52.75) ; C20.1@128.25,51.51 v1(128.25,52.75) ; C21.1@129.75,51.51 v1(129.75,52.75) ; v1(131.537,25.338) v1(132.251,26.051) C26.1@133.162,26.963 ; v1(132.588,24.287) v1(133.268,24.967) C23.1@134.213,25.912 ; C22.1@134.287,28.088 v1(135.31,29.11) v1(135.975,29.775) ; C24.1@135.463,27.037 v1(136.534,28.109) v1(137.175,28.75)
  other v1: 123.759,33.515 125.762,40.514
+1.8V: C73.1 C74.1 D5.2 L7.1 L8.1 L9.1 | length 5.2
  Bottom Layer w0.8: 137.649,9 C74.1@137.649,11.361 ; 139.313,9.056 C73.1@139.313,11.268 ; D5.2@143.744,8.981 v1(143.75,8.975) ; D5.2@143.75,14.675 v1(143.75,15.275)
  other v1: 142.5,8.875 145,8.875 137.649,9.382 139.313,9.411 137.649,10.181 139.313,10.162 141.125,12.25 142.25,12.25 143.5,12.25 144.75,12.25 146,12.25 53.25,41.5 53.25,43.625 53.25,46.125 53.25,48.625
+1.8V_VADD: C79.2 C80.2 C81.2 D3.40 L9.2 | length 2.6
  Top Layer 1 w0.3: v1(29.375,50.317) 29.375,50.64 29.378,50.643 D3.40@29.378,51.494
  Top Layer 1 w0.5: v1(29.375,48.885) v1(29.375,50.317)
  other v1: 43.875,48.75 29.375,49.625 43.875,49.875 47.125,49.875
  other v2: 45.5,49.875
+1.8V_VDD: C68.2 C76.2 C77.2 C78.2 D3.23 D3.58 L8.2 | length 3.1
  Top Layer 1 w0.15: D3.23@34.875,44.997 D3.23@34.878,44.994
  Top Layer 1 w0.3: v1(22.25,45) 22.256,44.994 D3.58@23.378,44.994 ; v1@33.58,45 33.586,44.994 D3.23@34.875,44.994
  Top Layer 1 w0.5: v1(32.875,45) v1@33.58,45
  other v1: 42.625,41.875 43.625,41.875 43.625,43.25 33.58,44.994 31.125,46.115
  other v2: 42.625,43.25
+1.8V_VDDPLL: C54.2 C56.2 C64.2 C65.2 C66.2 C67.2 D3.31 L7.2 | length 12.3
  Top Layer 1 w0.3: v1(32.125,49.25) v1@32.132,49.257 ; v1(32.125,49.875) v1@32.125,49.909 ; 32.466,50.25 33.375,50.25 35.226,52.101 36.466,52.101 C66.2@36.625,52.26 ; 33.502,49.25 33.758,48.994 D3.31@34.878,48.994 ; C66.2@36.771,52.365 36.886,52.25 C56.2@38.385,52.25 C54.2@38.385,53.875
  Top Layer 1 w0.5: v1(32.125,49.25) v1(33,49.25) 33.502,49.25 ; v1(32.125,49.875) 32.132,49.868 v1@32.132,49.257 ; v1@32.125,49.909 32.466,50.25
  other v1: 43,45 44.125,45.5 43,46.75
  other v2: 43,45.875
+3.3V: L1.1 L2.1 L3.1 L4.1 L6.1 R131.2 R138.2 R147_BTN1.1 R147_BTN21.1 R147_BTN22.1 SA1.2 VD35.2 VD36.2 | length 44.2
  Top Layer 1 w1: v1@135.832,6.52 v1@140.75,6.52 ; v1(140.75,6.5) 145.625,6.5 147.125,8 v1(147.125,23) 147.125,23.1 150.645,26.62 SA1.2@150.645,38.85
  other v1: 135.75,6.5 136.75,6.5 137.625,6.5 138.625,6.5 139.625,6.5 96.75,11.375 100,11.375 104.625,11.375 92.25,11.5 96.375,15.375 96.625,25.125
+3.3V: C3.1 C4.1 C5.1 C6.1 C7.1 C8.1 C9.1 C10.1 C11.1 C12.1 C13.1 C57.1 D1.B4 D1.B9 D1.C4 D1.C9 D1.D4 D1.D9 D1.K4 D1.K9 D1.L4 D1.L9 R170.2 SA1.1 | length 21.5
  Top Layer 1 w0.3: v1@121.756,39.509 121.759,39.509 122.253,39.014 D1.D4@122.256,39.014 ; v1(121.756,40.515) D1.C4@122.256,40.014 ; v1(121.758,41.51) 122.254,41.014 D1.B4@122.256,41.014 ; v1(121.761,31.512) 121.761,31.515 122.256,32.01 D1.L4@122.256,32.014 ; v1(121.761,32.514) 121.761,32.516 122.256,33.011 D1.K4@122.256,33.014 ; D1.L9@127.256,32.014 v1(127.757,31.512) ; D1.K9@127.256,33.014 127.259,33.014 127.755,32.518 v1(127.757,32.518) ; D1.D9@127.256,39.015 v1(127.754,39.514) ; D1.C9@127.256,40.014 127.256,40.016 127.751,40.512 v1@127.751,40.514 ; D1.B9@127.256,41.014 v1(127.751,41.51)
  Top Layer 1 w0.8: R170.2@149.74,51.375 C3.1@148.135,51.375 C4.1@148.135,49.875 149.875,49.875 150.653,49.097 150.653,47.685 SA1.1@150.645,47.677
  Top Layer 1 w1.5: v1(150.625,44) v1(150.625,44.75) SA1.1@150.625,48.061
  Bottom Layer w0.8: C7.1@123.5,43.865 123.51,43.875 v1(123.625,43.875) ; v1(123.625,29.26) C13.1@125.125,29.26 ; C7.1@123.625,43.865 C5.1@125,43.865
  other v1: 126.625,29.26 128.125,29.26 121.761,39.509 127.754,40.514 126.5,43.865 128,43.865 129.5,43.865 131,43.865 150.645,45.476 150.625,46.375
+3.3V_TTL: C28.1 C29.1 C30.1 C59.1 L1.2 ZQ1.4 | length 10.8
  Top Layer 1 w0.5: L1.2@145.325,23.125 145.23,23.22 145.23,24.78 C28.1@145.135,24.875 C29.1@145.135,26.5 C30.1@145.135,28.125 C59.1@145.135,29.75 146.625,29.75 147.831,30.956 147.831,31.706 ZQ1.4@147.954,31.829
+3.3V_VBAT: C45.2 C46.2 C47.2 L4.2 R48.2 | length 0
  Bottom Layer w0.3: C47.2@24.375,23.76 C47.2@24.385,23.75
+3.3V_VDD: C35.2 C36.2 C37.2 C38.2 C39.2 C40.2 C41.2 D2.11 D2.27 D2.50 D2.75 D2.100 L2.2 X6.1 | length 14.2
  Top Layer 1 w0.3: D2.11@21.268,22.702 22.398,22.702 22.446,22.75 v1(22.5,22.75) ; D2.100@23.018,29.452 v1(23.018,30.607) ; v1(23.5,16.125) 23.518,14.402 D2.27@23.518,13.952 ; D2.50@35.018,13.952 v1(35.952,13.952) ; D2.75@36.768,27.702 37.218,27.702 37.875,28.359 v1(37.875,28.375)
  Bottom Layer w0.3: C38.2@19.28,22.75 v1(22.5,22.75) ; C37.2@23,31.615 23.018,31.597 v1(23.018,30.607) ; v1(35.952,13.952) 37.163,13.952 C40.2@37.24,13.875 ; v1(37.875,28.375) 37.912,28.412 37.912,28.912 38.204,29.204 C41.2@39.022,29.204
  other v1: 41,31 41.875,31 44,31
  other v2: 42.875,31
+3.3V_VDDA: C42.2 C43.2 C44.2 D2.21 L3.2 | length 2.3
  Top Layer 1 w0.3: D2.21@21.268,17.702 v1(22.375,17.702)
  Bottom Layer w0.3: v1(22.375,17.702) 22.375,17.74 C44.2@23.5,17.74
  other v1: 40.75,27.75 41.75,27.75 44.375,27.75
  other v2: 43.125,27.75